# Altium PCB QR SCANNER NEW.PcbDoc (part 1 of 2)
Units mm, origin at the board's own origin, x right, y up, seen from the top; angles counter-clockwise.
Board outline 130 x 105 mm, 2 copper layers (Top Layer, Bottom Layer); 158 components, 113 nets, 501 pads, 106 vias.
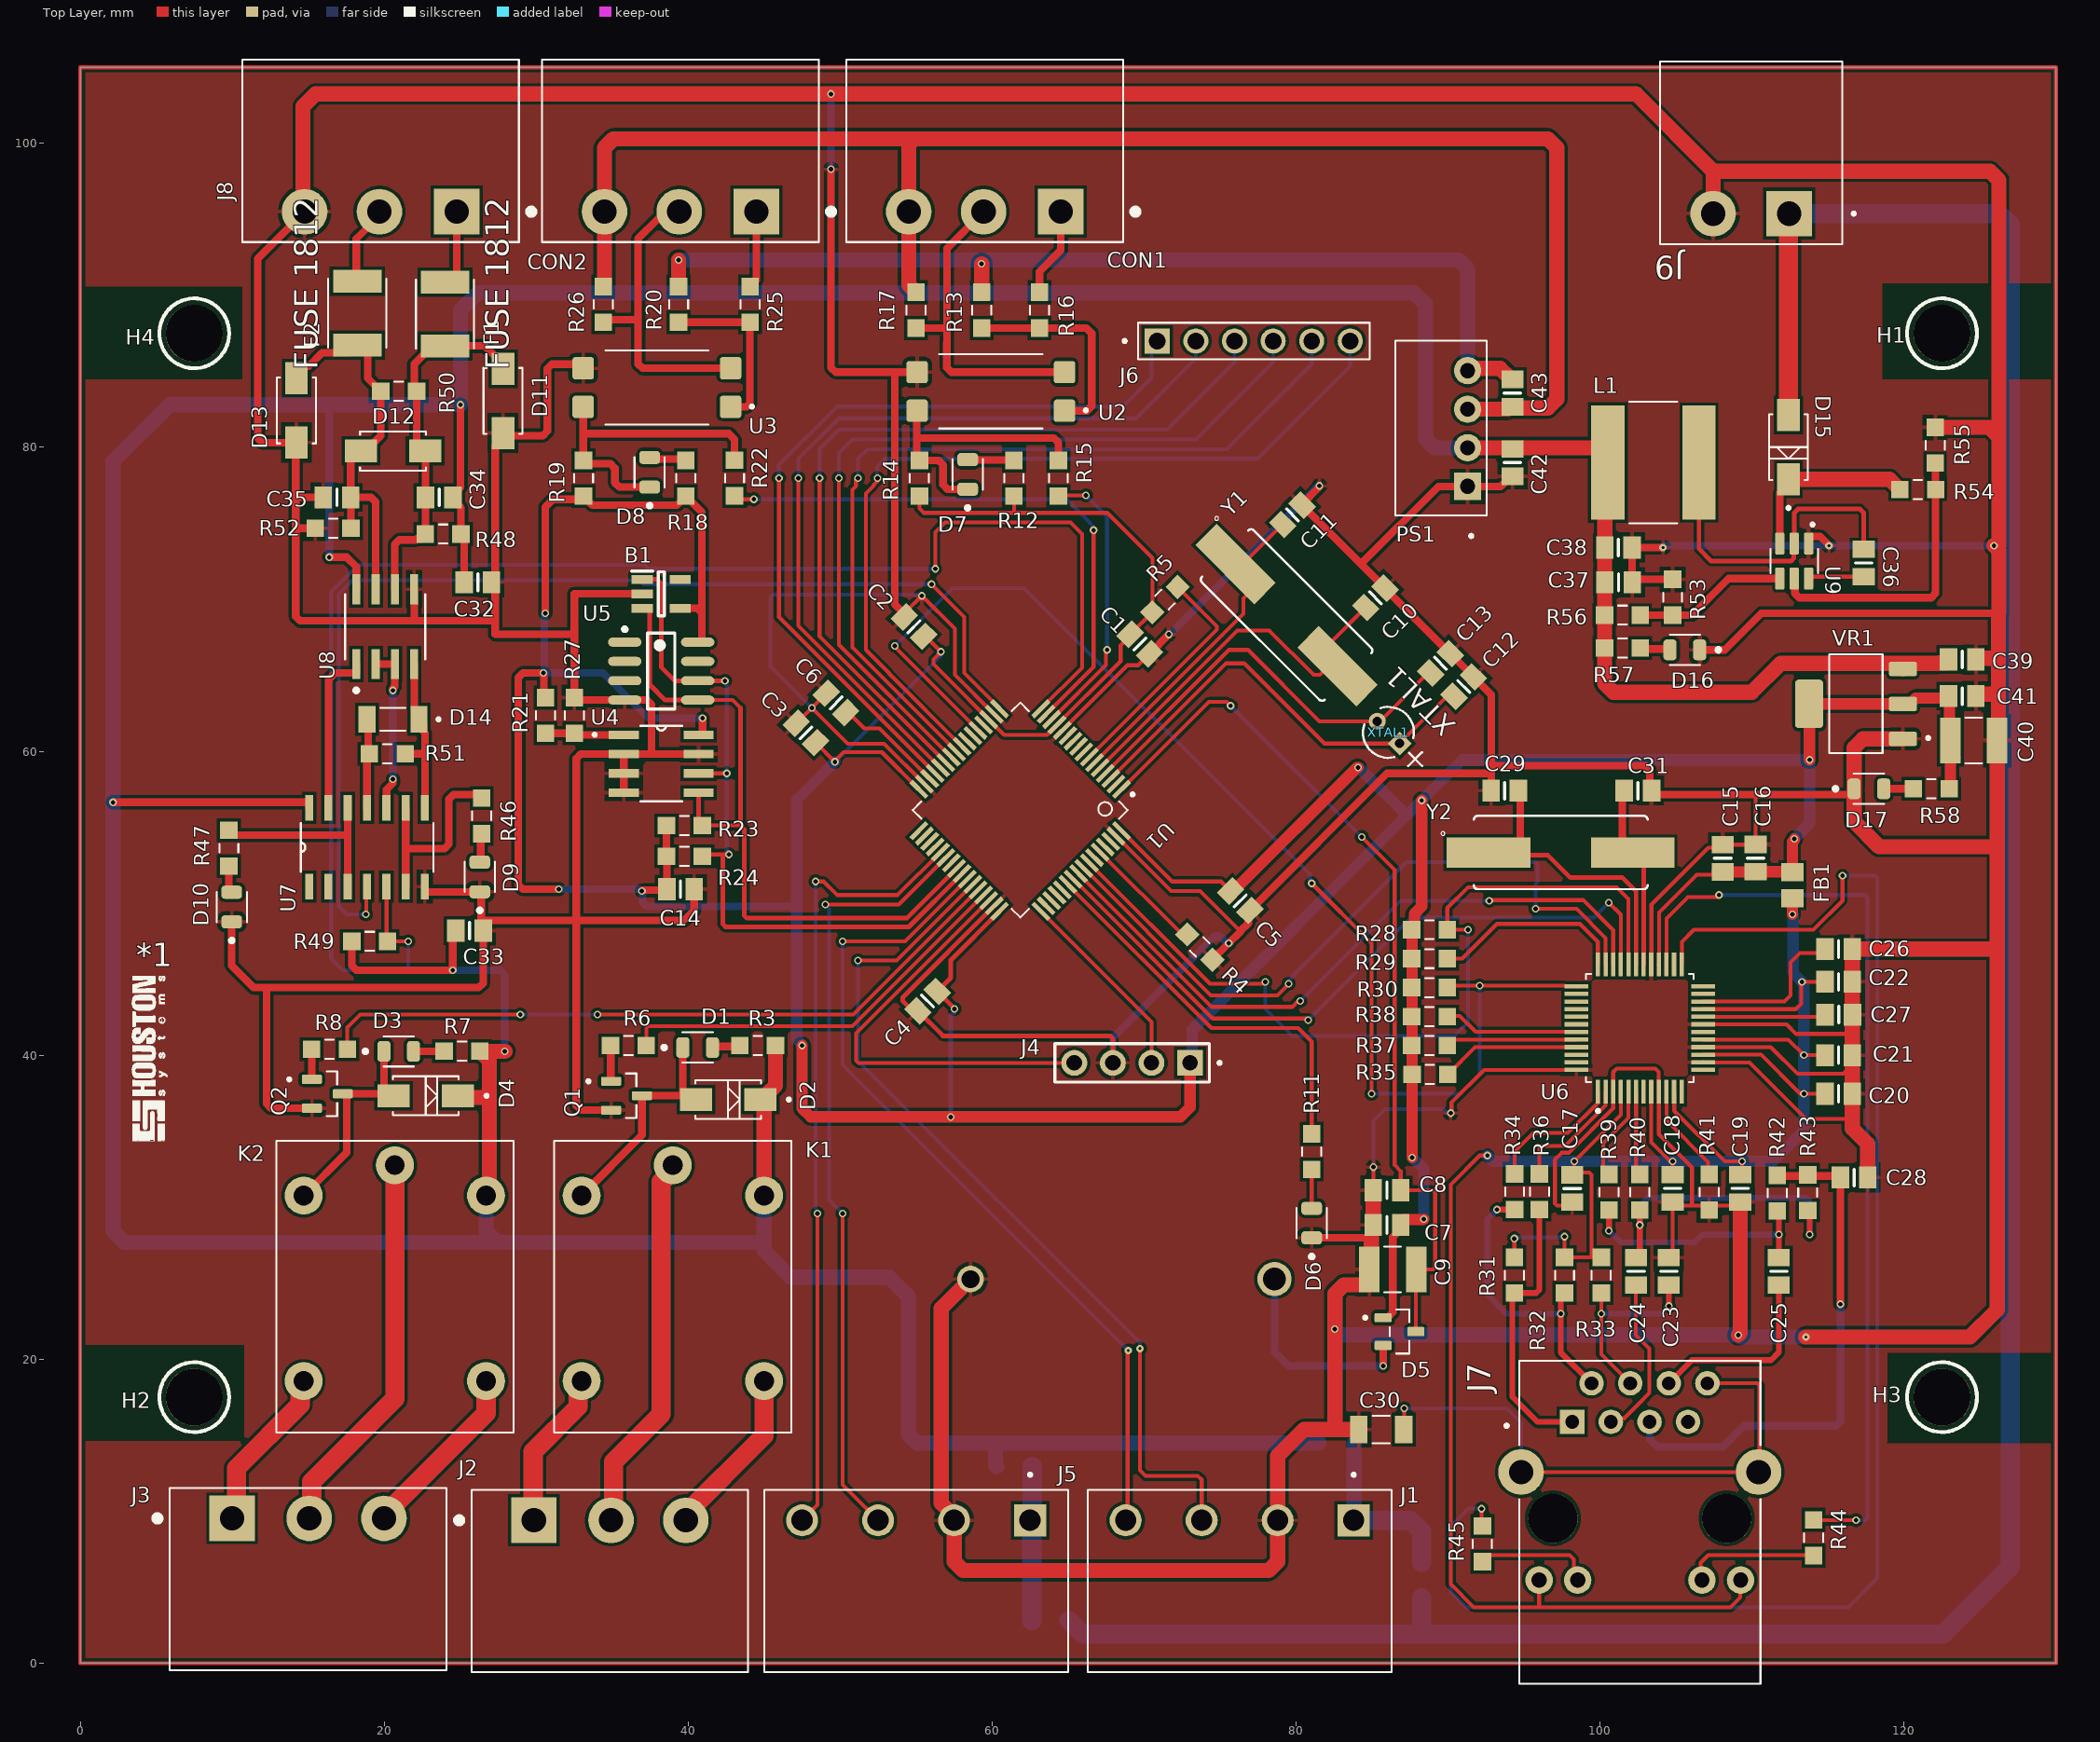
[diagram p0: Top Layer view]
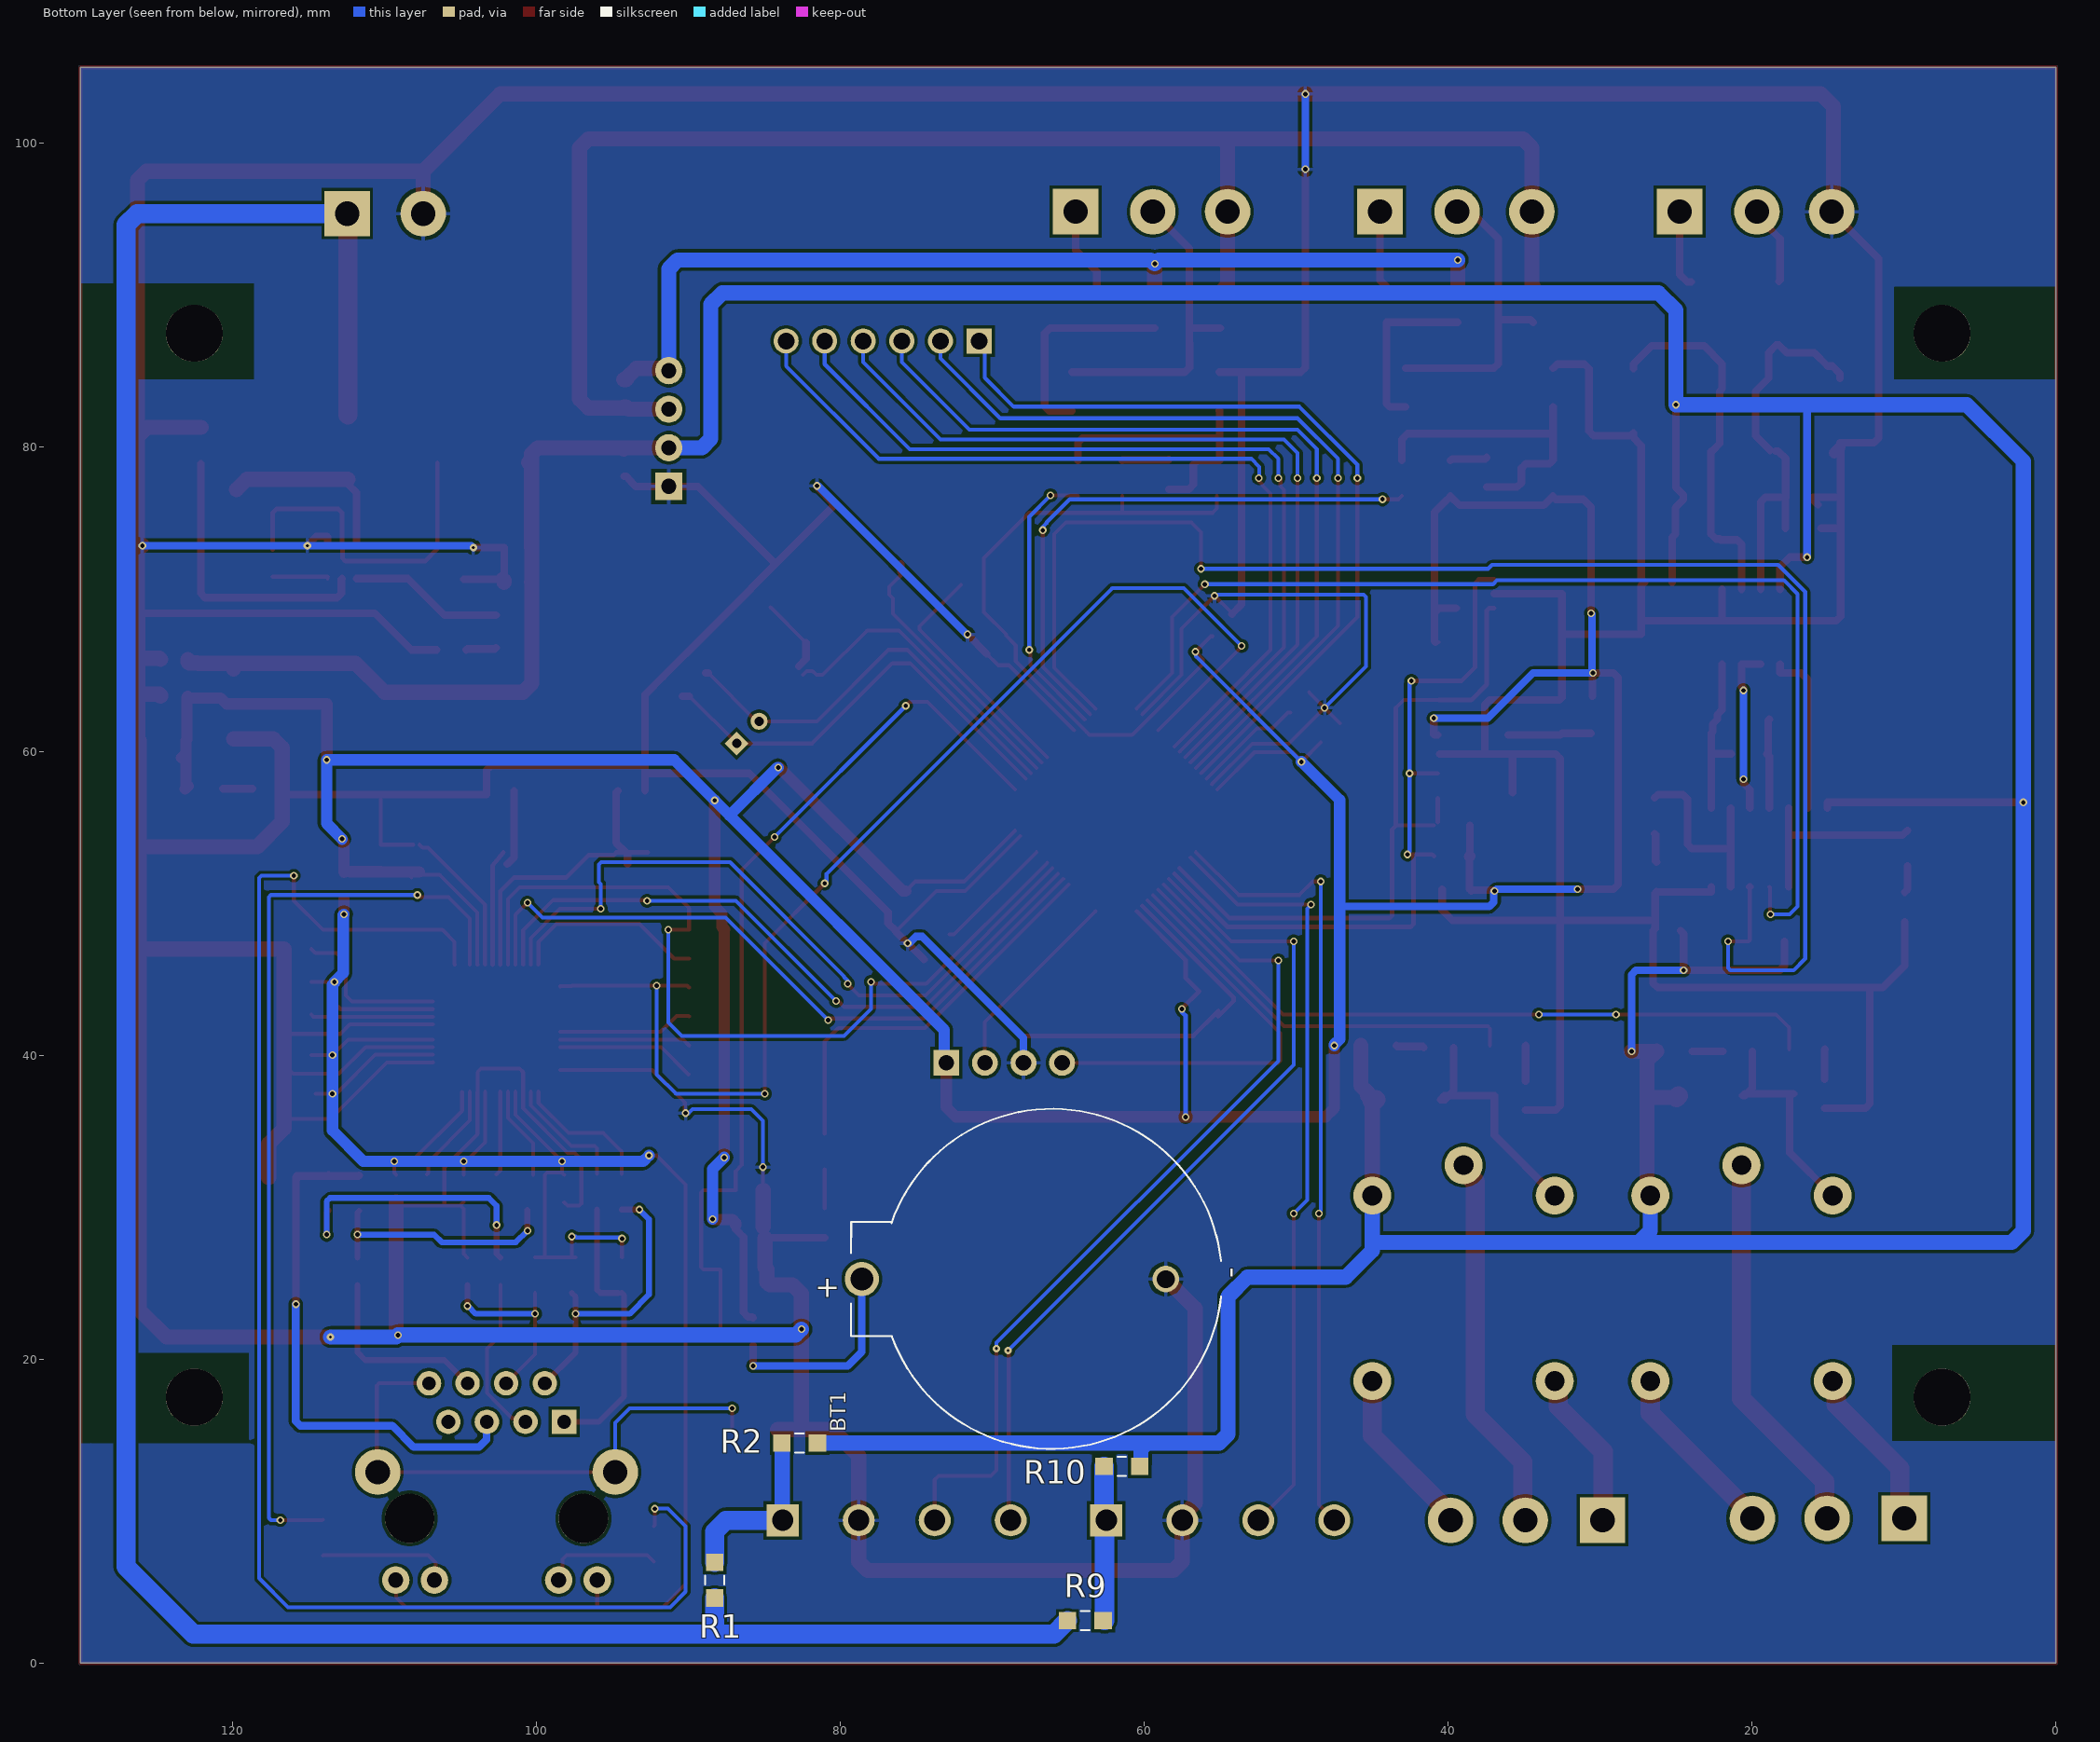
[diagram p1: Bottom Layer view, seen from below]
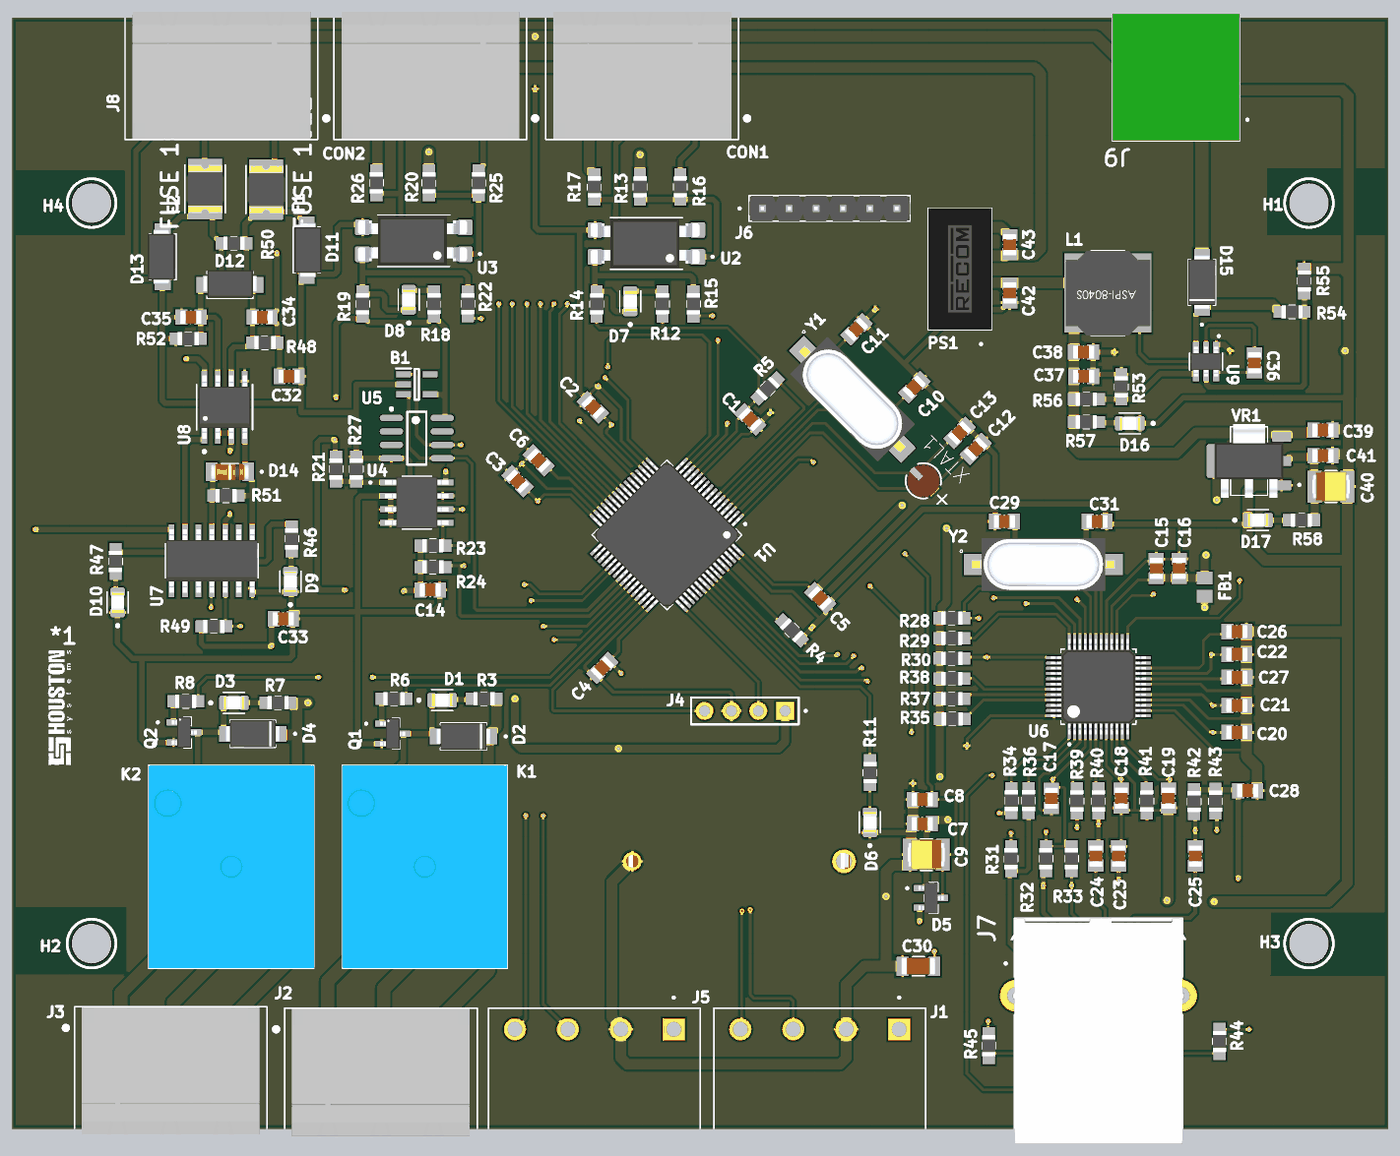
[diagram p3: 3D render of the assembled board from above, using the file's embedded part models]
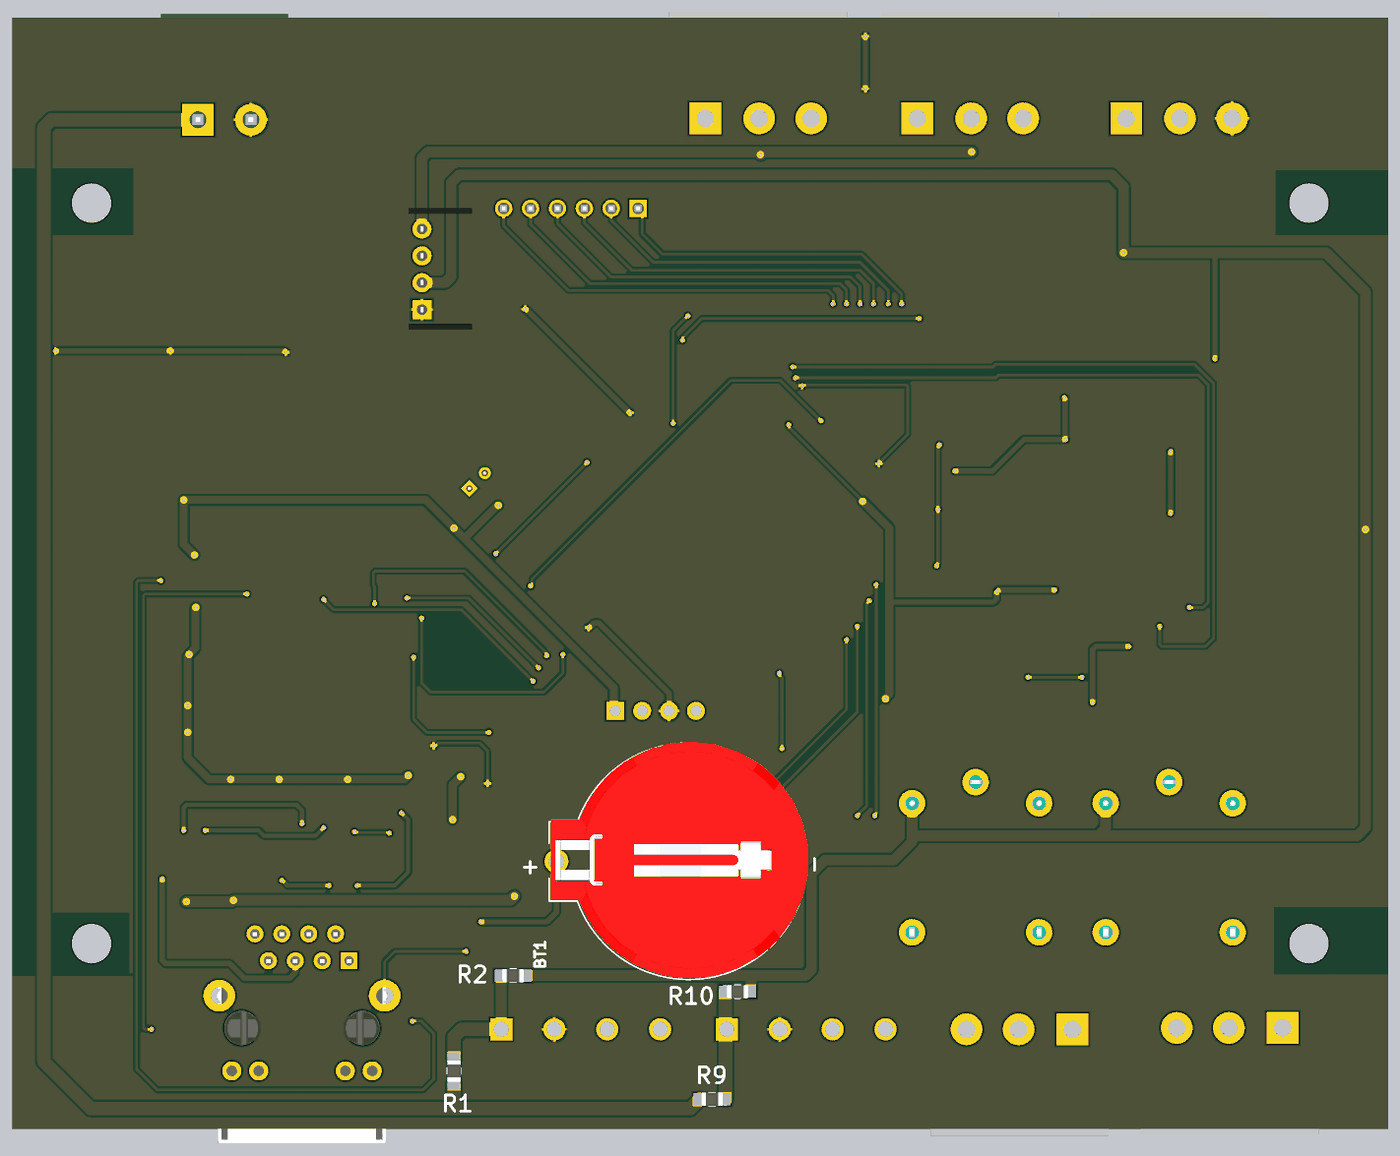
[diagram p4: 3D render of the assembled board from below, using the file's embedded part models]

## Layer stack, top to bottom
Top Solder: solder mask 0.0102, Solder Resist, Dk 3.5
Top Layer: signal copper 0.0356
Dielectric 1: dielectric 0.32, FR-4, Dk 4.8
Bottom Layer: signal copper 0.0356
Bottom Solder: solder mask 0.0102, Solder Resist, Dk 3.5

## Board outline
0,0 0,105 130,105 130,0

## Design rules (kind name [scope] priority, off if disabled: settings)
Clearance [All] p1: gap=0.2 ignorepadtopadclearanceinfootprint=TRUE
DiffPairsRouting [All] p1: maxlimit=0.254 minlimit=0.254 mostfreqgap=0.254 toplayer_minwidth=0.381 toplayer_maxwidth=0.381 toplayer_prefwidth=0.381 bottomlayer_minwidth=0.381 bottomlayer_maxwidth=0.381 bottomlayer_prefwidth=0.381 maxuncoupledlength=12.7
HoleSize [All] p1: absolutevalues=TRUE maxlimit=5 minlimit=0.1 maxpercent=80.000 minpercent=20.000
MinimumSolderMaskSliver [All] p1: minsoldermaskwidth=0
PolygonConnect [All] p1: connectstyle=Relief reliefconductorwidth=0.254 reliefentries=4 polygonreliefangle="90 Angle" airgapwidth=0.254
RoutingCorners [All] p1: cornerstyle=45-Degree minsetback=2 maxsetback=2.54
RoutingVias [All] p1: holewidth=0.2 width=0.5 viastyle="Through Hole" minholewidth=0.2 minwidth=0.5 maxholewidth=711 maxwidth=1.27
SilkToSolderMaskClearance [IsPad] p1: minsilkscreentomaskgap=0.1 clearancetoexposedcopper=TRUE
SolderMaskExpansion [All] p1: expansion=0.102 istentingtop=FALSE
SupplyNets "Schematic Supply Nets_9" [InNet('3V3')] p1: voltage=0.000
SupplyNets "Schematic Supply Nets_8" [InNet('+5')] p2: voltage=0.000
SupplyNets "Schematic Supply Nets_6" [InNet('GND')] p3: voltage=0.000
SupplyNets "Schematic Supply Nets_5" [InNet('+12')] p4: voltage=0.000
SupplyNets "Schematic Supply Nets_3" [InNet('AVDD')] p5: voltage=0.000
SupplyNets "Schematic Supply Nets_2" [InNet('SGND')] p6: voltage=0.000
SupplyNets "Schematic Supply Nets_1" [InNet('12VCC')] p7: voltage=0.000
SupplyNets "Schematic Supply Nets" [InNet('5VDC')] p8: voltage=0.000
Width [All] p1: maxlimit=2.5 minlimit=0.254 preferedwidth=0.254
25 further rules are at their usual default settings.

## Classes and differential pairs
differential pair class DIFF_100: RJ45 RX TX
net class "Single_50 ohm": INT MISO MOSI OSC_IN OSC_OUT RST SCS SWO/sck1 XI XO
component class Power: C36 C37 C38 C39 C40 C41 C42 C43 D15 D16 D17 J9 L1 PS1 R53 R54 R55 R56 R57 R58 U9 VR1
component class "LAN 485": *1 C15 C16 C17 C18 C19 C20 C21 C22 C23 C24 C25 C26 C27 C28 C29 C30 C31 C32 C33 C34 C35 D9 D10 D11 D12 D13 D14 F1 F2 FB1 H1 H2 H3 H4 J7 J8 R28 R29 R30 R31 R32 R33 R34 R35 R36 R37 R38 R39 R40 R41 R42 R43 R44 R45 R46 R47 R48 R49 R50 R51 R52 U6 U7 U8 Y2
component class main: B1 BT1 C1 C2 C3 C4 C5 C6 C7 C8 C9 C10 C11 C12 C13 C14 CON1 CON2 D1 D2 D3 D4 D5 D6 D7 D8 J1 J2 J3 J4 J5 J6 K1 K2 Q1 Q2 R1 R2 R3 R4 R5 R6 R7 R8 R9 R10 R11 R12 R13 R14 R15 R16 R17 R18 R19 R20 R21 R22 R23 R24 R25 R26 R27 U1 U2 U3 U4 U5 XTAL1 Y1
differential pair TX: +TX_P -TX_N
differential pair RX: +RX_P -RX_N
differential pair RJ45: +RJ45_P -RJ45_N

## Components (designator, comment, footprint, x,y, rotation, side; value= is the part's Value field where it differs from the comment)
*1 "HOUSTON_LOGO" HOUSTON_LOGO 8.255,37.719 r90 top
B1 "24AA02E48T-I_OT" SOT95P270X145-5N 38.227,70.358 r0 top
BT1 "Battery Holder (Open) Coin" "Battery Holder (Open) Coin" 68.58,25.273 r0 bottom
C1 "CAP 0.1uF 50V 0805" "CAP CER 0.1uF/50V 5%" 69.723,67.056 r135 top
C2 "CAP 0.1uF 50V 0805" "CAP CER 0.1uF/50V 5%" 54.863,68.2 r315 top
C3 "CAP 0.1uF 50V 0805" "CAP CER 0.1uF/50V 5%" 47.752,61.214 r315 top
C4 "CAP 0.1uF 50V 0805" "CAP CER 0.1uF/50V 5%" 55.753,43.561 r45 top
C5 "CAP 0.1uF 50V 0805" "CAP CER 0.1uF/50V 5%" 76.328,50.164 r135 top
C6 "CAP 4.7uF 50V 0805" "CAP CER 0.1uF/50V 5%" 49.732,63.179 r315 top
C7 "CAP 0.1uF 50V 0805" "CAP CER 0.1uF/50V 5%" 85.979,28.829 r0 top
C8 "CAP 0.1uF 50V 0805" "CAP CER 0.1uF/50V 5%" 85.979,31.115 r0 top
C9 "TANT CAP 10uF/16V 5% 3528(B)" "TANT CAP 3528(B)" 86.36,25.908 r180 top
C10 "CAP 20pF 50V 0805" "CAP CER 0.1uF/50V 5%" 85.217,70.104 r45 top
C11 "CAP 20pF 50V 0805" "CAP CER 0.1uF/50V 5%" 79.755,75.564 r45 top
C12 "CAP 4.3pF 50V 0805" "CAP CER 0.1uF/50V 5%" 91.028,64.262 r45 top
C13 "CAP 4.3pF 50V 0805" "CAP CER 0.1uF/50V 5%" 89.504,65.786 r45 top
C14 "CAP 0.1uF 50V 0805" "CAP CER 0.1uF/50V 5%" 39.497,50.927 r180 top
C15 "CAP 0.1uF 50V 0805" "CAP CER 0.1uF/50V 5%" 108.077,52.959 r270 top
C16 "CAP 10uF 50V 0805" "CAP CER 0.1uF/50V 5%" 110.236,52.97 r270 top
C17 "CAP 0.1uF 50V 0805" "CAP CER 0.1uF/50V 5%" 98.171,31.231 r90 top
C18 "CAP 0.1uF 50V 0805" "CAP CER 0.1uF/50V 5%" 104.775,31.242 r90 top
C19 "CAP 0.1uF 50V 0805" "CAP CER 0.1uF/50V 5%" 109.22,31.242 r90 top
C20 "CAP 0.1uF 50V 0805" "CAP CER 0.1uF/50V 5%" 115.697,37.465 r180 top
C21 "CAP 0.1uF 50V 0805" "CAP CER 0.1uF/50V 5%" 115.697,40.005 r180 top
C22 "CAP 0.1uF 50V 0805" "CAP CER 0.1uF/50V 5%" 115.697,44.831 r180 top
C23 "CAP 22nF 50V 0805" "CAP CER 0.1uF/50V 5%" 104.521,25.781 r270 top
C24 "CAP 6.8nF 50V 0805" "CAP CER 0.1uF/50V 5%" 102.362,25.781 r90 top
C25 "CAP 6.8nF 50V 0805" "CAP CER 0.1uF/50V 5%" 111.76,25.781 r90 top
C26 "CAP 10nF 50V 0805" "CAP CER 0.1uF/50V 5%" 115.697,46.99 r180 top
C27 "CAP 4.7uF 50V 0805" "CAP CER 0.1uF/50V 5%" 115.708,42.672 r180 top
C28 "CAP 10nF 50V 0805" "CAP CER 0.1uF/50V 5%" 116.712,31.95 r180 top
C29 "CAP 18pF 50V 0805" "CAP CER 0.1uF/50V 5%" 93.726,57.404 r180 top
C30 "CAP CER 1nF/2KV 1206 5%" "CAP CER 1nF/2KV 1206 5%" 85.598,15.367 r0 top
C31 "CAP 18pF 50V 0805" "CAP CER 0.1uF/50V 5%" 102.489,57.404 r0 top
C32 "CAP 0.1uF 50V 0805" "CAP CER 0.1uF/50V 5%" 26.162,71.12 r0 top
C33 "CAP 0.1uF 50V 0805" "CAP CER 0.1uF/50V 5%" 25.612,48.199 r180 top
C34 "CAP 1nF 50V 0805" "CAP CER 0.1uF/50V 5%" 23.622,76.708 r0 top
C35 "CAP 1nF 50V 0805" "CAP CER 0.1uF/50V 5%" 16.891,76.708 r180 top
C36 "CAP 0.1uF 50V 0805" "CAP CER 0.1uF/50V 5%" 117.348,72.39 r270 top
C37 "CAP 22uF 50V 0805" "CAP CER 0.1uF/50V 5%" 101.219,71.12 r0 top
C38 "CAP 22uF 50V 0805" "CAP CER 0.1uF/50V 5%" 101.208,73.406 r0 top
C39 "CAP 10uF 50V 0805" "CAP CER 0.1uF/50V 5%" 123.825,66.04 r180 top
C40 "TANT CAP 10uF/16V 5% 3528(B)" "TANT CAP 3528(B)" 124.587,60.706 r0 top
C41 "CAP 0.1uF 50V 0805" "CAP CER 0.1uF/50V 5%" 123.825,63.627 r180 top
C42 "CAP 0.1uF 50V 0805" "CAP CER 0.1uF/50V 5%" 94.234,78.994 r90 top
C43 "CAP 0.1uF 50V 0805" "CAP CER 0.1uF/50V 5%" 94.234,83.566 r90 top
CON1 "3 Pin Terminal Block 5MM RA" "3 Pin Terminal Block 5MM RA" 59.516,95.504 r180 top
CON2 "3 Pin Terminal Block 5MM RA" "3 Pin Terminal Block 5MM RA" 39.492,95.504 r180 top
D1 "LED-0805" LED-0805 40.624,40.509 r0 top
D2 "DIODE M7 DO-214AC" "DIODE M7 DO-214AC" 42.628,37.084 r180 top
D3 "LED-0805" LED-0805 20.955,40.255 r0 top
D4 "DIODE M7 DO-214AC" "DIODE M7 DO-214AC" 22.733,37.334 r180 top
D5 "Schottky Diode SOT23" "Schottky Diode SOT23 BAT54C" 86.8,21.818 r0 top
D6 "LED-0805" LED-0805 81.026,28.956 r90 top
D7 "LED-0805" LED-0805 58.39,78.218 r90 top
D8 "LED-0805" LED-0805 37.465,78.359 r90 top
D9 "LED-0805" LED-0805 26.289,51.73 r90 top
D10 "LED-0805" LED-0805 9.97,49.753 r90 top
D11 "TVS SMAJ6.0CA BiD" "TVS SMAJ6.0CA DO-214AC (SMA)" 27.813,83.058 r270 top
D12 "TVS SMAJ6.0CA BiD" "TVS SMAJ6.0CA DO-214AC (SMA)" 20.574,79.756 r0 top
D13 "TVS SMAJ6.0CA BiD" "TVS SMAJ6.0CA DO-214AC (SMA)" 14.224,82.423 r90 top
D14 "DIODE-1N4148W-SOD-80" DIODE-1N4148W-SOD-80 20.574,62.103 r180 top
D15 "DIODE M7 DO-214AC" "DIODE M7 DO-214AC" 112.395,80.01 r90 top
D16 "LED-0805" LED-0805 105.578,66.675 r180 top
D17 "LED-0805" LED-0805 117.688,57.531 r0 top
F1 "FUSE 1812" "FUSE 1812" 24.003,88.773 r90 top
F2 "FUSE 1812" "FUSE 1812" 18.231,88.829 r90 top
FB1 "FB 0805" "FB 0805" 112.649,51.181 r270 top
H1 "ScrewHole_3.75mmD" "ScrewHole_3.75mmD - duplicate" 122.5,87.5 r0 top locked
H2 "ScrewHole_3.75mmD" "ScrewHole_3.75mmD - duplicate" 7.5,17.5 r0 top locked
H3 "ScrewHole_3.75mmD" "ScrewHole_3.75mmD - duplicate" 122.5,17.5 r0 top locked
H4 "ScrewHole_3.75mmD" "ScrewHole_3.75mmD - duplicate" 7.5,87.5 r0 top locked
J1 "282811-4" TE_282811-4 76.287,9.398 r180 top
J2 "3 Pin Terminal Block 5MM RA" "3 Pin Terminal Block 5MM RA" 34.845,9.398 r0 top
J3 "3 Pin Terminal Block 5MM RA" "3 Pin Terminal Block 5MM RA" 14.986,9.525 r0 top
J4 "BURGE 4 PIN 2.54mm" "BURGE 4 PIN 2.54mm" 69.215,39.497 r180 top
J5 "282811-4" TE_282811-4 54.998,9.398 r180 top
J6 "BERGE 6 PIN 2.54mm" "BERGE 6 PIN 2.54mm" 77.216,86.995 r0 top
J7 "RJ45 8P8C" "RJ45 8P8C" 102.616,9.525 r0 top locked
J8 "3 Pin Terminal Block 5MM RA" "3 Pin Terminal Block 5MM RA" 19.765,95.504 r180 top
J9 "2 Pin Terminal Block 5MM RA" "2 Pin Terminal Block 5MM RA" 112.442,95.377 r180 top
K1 "Relay_5Pin SPDT THT" "Relay_5Pin SPDT THT" 38.989,24.765 r270 top
K2 "Relay_5Pin SPDT THT" "Relay_5Pin SPDT THT" 20.701,24.765 r270 top
L1 "INDUCTOR 8040S SWPA8040S120MT" "INDUCTOR 8040S SWPA8040S120MT" 103.505,78.994 r180 top
PS1 "RFM-0505S SIP4" RFM-0505S 89.535,81.28 r90 top
Q1 "NPN SOT-23 SMT BC848C_RFG" "NPN SOT-23 SMT BC848C_RFG" 35.941,37.338 r0 top
Q2 "NPN SOT-23 SMT BC848C_RFG" "NPN SOT-23 SMT BC848C_RFG" 16.256,37.465 r0 top
R1 "RES 10K 0.25W 5% 0805" "RES 0805 10K/0.25W 5%" 88.265,5.461 r90 bottom
R2 "RES 10K 0.25W 5% 0805" "RES 0805 10K/0.25W 5%" 82.677,14.478 r0 bottom
R3 "RES 470R 0.25W 5% 0805" "RES 0805 10K/0.25W 5%" 44.577,40.64 r0 top
R4 "RES 10K 0.25W 5% 0805" "RES 0805 10K/0.25W 5%" 73.66,47.117 r135 top
R5 "RES 10K 0.25W 5% 0805" "RES 0805 10K/0.25W 5%" 71.374,69.977 r45 top
R6 "RES 470R 0.25W 5% 0805" "RES 0805 10K/0.25W 5%" 36.068,40.64 r180 top
R7 "RES 470R 0.25W 5% 0805" "RES 0805 10K/0.25W 5%" 25.118,40.264 r0 top
R8 "RES 470R 0.25W 5% 0805" "RES 0805 10K/0.25W 5%" 16.399,40.396 r180 top
R9 "RES 10K 0.25W 5% 0805" "RES 0805 10K/0.25W 5%" 63.881,2.794 r180 bottom
R10 "RES 10K 0.25W 5% 0805" "RES 0805 10K/0.25W 5%" 61.468,12.954 r0 bottom
R11 "RES 330R 0.25W 5% 0805" "RES 0805 10K/0.25W 5%" 81.026,33.655 r90 top
R12 "RES 330R 0.25W 5% 0805" "RES 0805 10K/0.25W 5%" 61.438,77.964 r270 top
R13 "RES 15K 0.25W 5% 0805" "RES 0805 10K/0.25W 5%" 59.309,89.027 r270 top
R14 "RES 5.1K 0.25W 5% 0805" "RES 0805 10K/0.25W 5%" 55.215,77.964 r90 top
R15 "RES 0E 0.25W 5% 0805" "RES 0805 10K/0.25W 5%" 64.359,77.964 r270 top
R16 "RES 1K 0.25W 5% 0805" "RES 0805 10K/0.25W 5%" 63.119,89.027 r270 top
R17 "RES 0E 0.25W 5% 0805" "RES 0805 10K/0.25W 5%" 54.991,89.027 r270 top
R18 "RES 330R 0.25W 5% 0805" "RES 0805 10K/0.25W 5%" 39.848,77.964 r270 top
R19 "RES 5.1K 0.25W 5% 0805" "RES 0805 10K/0.25W 5%" 33.117,77.964 r90 top
R20 "RES 15K 0.25W 5% 0805" "RES 0805 10K/0.25W 5%" 39.37,89.408 r270 top
R21 "RES 4.7K 0.25W 5% 0805" "RES 0805 10K/0.25W 5%" 30.607,62.357 r90 top
R22 "RES 0E 0.25W 5% 0805" "RES 0805 10K/0.25W 5%" 43.053,77.978 r270 top
R23 "RES 4.7K 0.25W 5% 0805" "RES 0805 10K/0.25W 5%" 39.751,55.118 r180 top
R24 "RES 4.7K 0.25W 5% 0805" "RES 0805 10K/0.25W 5%" 39.751,53.086 r180 top
R25 "RES 1K 0.25W 5% 0805" "RES 0805 10K/0.25W 5%" 44.069,89.408 r270 top
R26 "RES 0E 0.25W 5% 0805" "RES 0805 10K/0.25W 5%" 34.417,89.408 r270 top
R27 "RES 4.7K 0.25W 5% 0805" "RES 0805 10K/0.25W 5%" 32.512,62.357 r270 top
R28 "RES 10K 0.25W 5% 0805" "RES 0805 10K/0.25W 5%" 88.773,48.26 r180 top
R29 "RES 10K 0.25W 5% 0805" "RES 0805 10K/0.25W 5%" 88.773,46.355 r180 top
R30 "RES 10K 0.25W 5% 0805" "RES 0805 10K/0.25W 5%" 88.773,44.45 r180 top
R31 "RES 49E9 0.25W 1% 0805" "RES 0805 10K/0.25W 5%" 94.361,25.527 r90 top
R32 "RES 49E9 0.25W 1% 0805" "RES 0805 10K/0.25W 5%" 97.663,25.527 r90 top
R33 "RES 10E 0.25W 5% 0805" "RES 0805 10K/0.25W 5%" 100.076,25.527 r90 top
R34 "RES 0E 0.25W 5% 0805" "RES 0805 10K/0.25W 5%" 94.381,31.02 r90 top
R35 "RES 10K 0.25W 5% 0805" "RES 0805 10K/0.25W 5%" 88.805,38.735 r180 top
R36 "RES 0E 0.25W 5% 0805" "RES 0805 10K/0.25W 5%" 96.012,31.02 r90 top
R37 "RES 10K 0.25W 5% 0805" "RES 0805 10K/0.25W 5%" 88.773,40.64 r180 top
R38 "RES 10K 0.25W 5% 0805" "RES 0805 10K/0.25W 5%" 88.773,42.545 r180 top
R39 "RES 0E 0.25W 5% 0805" "RES 0805 10K/0.25W 5%" 100.584,30.988 r90 top
R40 "RES 0E 0.25W 5% 0805" "RES 0805 10K/0.25W 5%" 102.616,30.988 r90 top
R41 "RES 12.4K 0.25W 5% 0805" "RES 0805 10K/0.25W 5%" 107.188,30.988 r90 top
R42 "RES 49E9 0.25W 1% 0805" "RES 0805 10K/0.25W 5%" 111.654,30.925 r270 top
R43 "RES 49E9 0.25W 1% 0805" "RES 0805 10K/0.25W 5%" 113.665,30.956 r270 top
R44 "RES 330E 0.25W 5% 0805" "RES 0805 10K/0.25W 5%" 114.046,8.255 r270 top
R45 "RES 330E 0.25W 5% 0805" "RES 0805 10K/0.25W 5%" 92.257,7.847 r270 top
R46 "RES 330R 0.25W 5% 0805" "RES 0805 10K/0.25W 5%" 26.416,55.753 r90 top
R47 "RES 330R 0.25W 5% 0805" "RES 0805 10K/0.25W 5%" 9.779,53.626 r90 top
R48 "RES 1K 0.25W 5% 0805" "RES 0805 10K/0.25W 5%" 23.876,74.295 r180 top
R49 "RES 10K 0.25W 5% 0805" "RES 0805 10K/0.25W 5%" 19.05,47.498 r180 top
R50 "RES120E 0.25W 5% 0805" "RES 0805 10K/0.25W 5%" 20.955,83.693 r0 top
R51 "RES 1K 0.25W 5% 0805" "RES 0805 10K/0.25W 5%" 20.202,59.832 r0 top
R52 "RES 1K 0.25W 5% 0805" "RES 0805 10K/0.25W 5%" 16.637,74.676 r0 top
R53 "RES 10K 0.25W 5% 0805" "RES 0805 10K/0.25W 5%" 104.775,70.136 r90 top
R54 "RES 15K 0.25W 5% 0805" "RES 0805 10K/0.25W 5%" 120.904,77.216 r0 top
R55 "RES 10K 0.25W 5% 0805" "RES 0805 10K/0.25W 5%" 122.047,80.137 r90 top
R56 "RES 75K 0.25W 5% 0805" "RES 0805 10K/0.25W 5%" 101.473,68.961 r0 top
R57 "RES 470R 0.25W 5% 0805" "RES 0805 10K/0.25W 5%" 101.473,66.802 r180 top
R58 "RES 220R 0.25W 5% 0805" "RES 0805 10K/0.25W 5%" 121.793,57.531 r0 top
U1 "STM32F401RET6 LQFP-64" "STM32F401RE Cortex-M4" 61.849,56.134 r225 top
U2 "OPTOCPLR EL817S1-FV" "OPTOCPLR EL817S1-FV" 59.914,83.679 r180 top
U3 "OPTOCPLR EL817S1-FV" "OPTOCPLR EL817S1-FV" 37.943,83.933 r180 top
U4 "EEPROM AT24C512C SOIC-8" "EEPROM AT24C512C SOIC-8" 38.227,59.182 r0 top
U5 "24AA02E48T-I/SN" SOIC-SN8_N 38.227,65.278 r0 top
U6 "W5500 LQFP-48" "W5500 LQFP-48" 102.616,41.783 r90 top
U7 "74HC14D SOIC-14" "74HC14D SOIC-14" 18.87,53.68 r90 top
U8 "MAX485CSA SOIC-8" MAX485CSA 20.066,68.199 r90 top
U9 "TPS54202DDCT" SOT95P280X110-6N 112.776,72.517 r270 top
VR1 "LM1117IMPX-3.3V SOT-223" "LM1117IMPX-3.3V SOT-223" 116.84,63.119 r180 top
XTAL1 "MCRJ332768F1220HOW" CRYSTAL_MCRJ332768F1220HOW_MTC 86.808,60.512 r135 top
Y1 "Crystal 8 Mhz SMD 2 pin" "Crystal 16 Mhz SMD 2 pin" 79.375,68.961 r315 top
Y2 "Crystal 25 Mhz SMD 2 pin" "Crystal 16 Mhz SMD 2 pin" 97.409,53.34 r0 top

## Footprints (in the part's own frame and the unit in brackets; to place one, negate y for a bottom-side part, rotate by r counter-clockwise, add the part's x,y. Pads: shape width x height; smd on the part's side, far side on the other; paste and mask are expansions set on the pad)
"2 Pin Terminal Block 5MM RA" [mm]
  rect 3x3 hole 1.6: 1(0,0)
  round 3 hole 1.6: 2(5,0)
  silkscreen extent -4.35,-10 8.5,2, body extent -3.5,-10 8.5,2, height 8.5
"3 Pin Terminal Block 5MM RA" [mm]
  rect 3x3 hole 1.6: 1(-5,0)
  round 3 hole 1.6: 2(0.08,0) 3(5,0)
  silkscreen extent -10.11,-10 9.1,2, body extent -8.42,-10.06 8.38,1.94, height 8.97
"74HC14D SOIC-14" [mil] "Inverter IC 6 Channel Schmitt Trigger 14-SO/SOIC-14"
  rect 67x21 smd: 1(-102,150) 2(-102,100) 3(-102,50) 4(-102,0) 5(-102,-50) 6(-102,-100) 7(-102,-150) 8(102,-150) 9(102,-100) 10(102,-50) 11(102,0) 12(102,50) 13(102,100) 14(102,150)
  silkscreen extent -63,-172 63,172, body extent -118,-170 118,170, height 69
"Battery Holder (Open) Coin" [mm] "Battery Holder (Open) Coin"
  round 1.755 hole 1.17: NEG(-10,0)
  round 2.25 hole 1.5: POS(10,0)
  silkscreen extent -13.63,-11.2 10.7,11.17, body extent -13.84,-11.3 10.54,11.05, height 8.74
"BERGE 6 PIN 2.54mm" [mm] "BERGE 6 PIN 2.54mm, AMPHENOL_68604-406HLF"
  rect 1.65x1.65 / inner round 1.65 / far side rect 1.65x1.65 hole 1.1: 1(-6.35,0)
  round 1.65 hole 1.1: 2(-3.81,0) 3(-1.27,0) 4(1.27,0) 5(3.81,0) 6(6.35,0)
  silkscreen extent -8.6,-1.2 7.62,1.2, body extent -7.62,-1.2 7.62,1.2, height 12.19
"BURGE 4 PIN 2.54mm" [mm] "BURGE 4 PIN 2.54mm TSW-104-X-X-S-LL"
  rect 1.7x1.7 hole 1.02: 01(-3.81,0)
  round 1.7 hole 1.02: 02(-1.27,0) 03(1.27,0) 04(3.81,0)
  silkscreen extent -5.85,-1.27 5.08,1.27
"CAP CER 0.1uF/50V 5%" [mm] "CAP CER 0.1uF/50V  Ceramic Capacitor X7R 0805 (2012 Metric) SMT"
  rect 1.15x1.45 smd: 1(-0.9,0) 2(0.9,0)
  silkscreen extent 0,-0.55 0,0.55, body extent -1,-0.62 1,0.62, height 1.35
"CAP CER 1nF/2KV 1206 5%" [mm] "1000 pF Â±10% 2000V (2kV) Ceramic Capacitor X7R 1206 (3216 Metric) C1206C102KGRACAUTO"
  rect 1.16x1.82 smd: 1(-1.475,0) 2(1.475,0)
  silkscreen extent -0.57,-0.9 0.57,0.9, body extent -1.6,-0.8 1.6,0.8, height 1.75
"Crystal 16 Mhz SMD 2 pin" [mm] "16 MHz Â±30ppm Crystal 20pF 60 Ohms HC-49/US FOXSDLF/128-20 16 Mhz Crystal SMD –CSM-4ALX(28ALX) SMT12.5mmX4.85mmX4mm"
  rect 5.5x2 smd: 1(-4.75,0) 2(4.75,0)
  silkscreen extent -7.88,-2.41 5.71,2.41, body extent -6.75,-2.5 6.75,2.5, height 4.5
CRYSTAL_MCRJ332768F1220HOW_MTC [mil]
  rect 44x44 hole 24 paste-99999 mask+0: 1(0,0)
  round 44 hole 24 paste-99999 mask+0: 2(81.5,0)
  silkscreen extent -82,-66 99,66, body extent -20,-61 103,61, height 328
"DIODE M7 DO-214AC" [mm] "M7 General Purpose SMD Rectifier Diode SMA (DO-214AC) 1A 1000V 1n4007  DIOM4325X250N"
  rect 2.12x1.5 smd: A(2.115,0) C(-2.115,0)
  silkscreen extent -4.1,-1.28 2.16,1.28, body extent -2.57,-1.28 2.57,1.28, height 2.5
DIODE-1N4148W-SOD-80 [mm] "DIODE-1N4148W-SOD-80 is a general-purpose silicon diode LL4148_L1G"
  rect 1.11x1.73 smd: A(1.705,0) C(-1.705,0)
  silkscreen extent -3.1,-0.75 0.83,0.75, body extent -1.75,-0.76 1.75,0.83, height 1.57
"EEPROM AT24C512C SOIC-8" [mil] "EEPROM Memory IC 512Kb (64K x 8) IÂ²C 400 kHz 900 ns SOIC-8 AT24C512C-SSHM-T"
  rect 78x22 smd: 1(-97,75) 2(-97,25) 3(-97,-25) 4(-97,-75) 5(97,-75) 6(97,-25) 7(97,25) 8(97,75)
  silkscreen extent -176,-98 54,98, body extent -118,-96 118,96, height 69
"FB 0805" [mm] "MH2029-101Y-Bourns Inc.-Ferrite Bead, 100 Ohms @ 100 MHz , Signal Line Ferrite Bead 0805 (2012 Metric) 2A 100mOhm"
  rect 1.2x1.47 smd: 1(-0.86,0) 2(0.86,0)
"FUSE 1812" [mm] "Polymeric PTC Resettable Fuse 60V 100 mA Ih Surface Mount 1812 (4532 Metric), Concave, MF-MSMF010-2"
  rect 1.5x3.2 smd: 1(-2.1,0) 2(2.1,0)
  silkscreen extent -2.27,-1.91 2.27,1.91, body extent -2.27,-1.62 2.27,1.62, height 0.85
HOUSTON_LOGO [mm]
  silkscreen extent -3.35,2.52 7.49,4.87
"INDUCTOR 8040S SWPA8040S120MT" [mm]
  rect 2.2x7.5 smd: 1(-3,0) 2(3,0)
  silkscreen extent -1.58,-4 1.58,4, body extent -4,-4 4,4, height 4
LED-0805 [mm] "Red 640nm LED Indication - Discrete 1.85V 0805 (2012 Metric) SMT APT2012SRCPRV"
  rrect50% 0.86x1.36 smd: A(0.975,0) C(-0.975,0)
  silkscreen extent -2.3,-0.99 1,1, body extent -1,-0.63 1,0.63, height 0.75
"LM1117IMPX-3.3V SOT-223" [mm] "LM1117IMPX-3.3V 800-mA 15-V linear voltage regulator SOT230P700X180-4N"
  rrect25% 1.84x0.93 smd: 1(-3.085,2.3) 2(-3.085,0) 3(-3.085,-2.3)
  rrect25% 1.84x3.19 smd: 4(3.085,0)
  silkscreen extent -4.85,-3.25 1.75,3.25, body extent -3.5,-3.25 3.5,3.25, height 1.8
MAX485CSA [mil] "MAX485CSA-RS-485/RS-422 Transceivers, SOIC-8"
  rect 78x21 smd: 1(-97,75) 2(-97,25) 3(-97,-25) 4(-97,-75) 5(97,-75) 6(97,-25) 7(97,25) 8(97,75)
  silkscreen extent -170,-104 84,104, body extent -118,-96 118,96, height 69
"NPN SOT-23 SMT BC848C_RFG" [mm] "NPN SOT-23 SMT BC848C_RFG SOT95P237X112-3N"
  rrect25% 1.32x0.59 smd: 1(-1.015,0.95) 2(-1.015,-0.95) 3(1.015,0)
  silkscreen extent -2.6,-1.46 0.65,1.46, body extent -1.19,-1.46 1.19,1.46, height 1.12
"OPTOCPLR EL817S1-FV" [mm] "OPTOCPLR EL817S1 SOIC254P1030X390-4N_EL817S1-FV"
  rrect25% 1.41x1.47 smd: 1(-4.85,1.27) 2(-4.85,-1.27) 3(4.85,-1.27) 4(4.85,1.27)
  silkscreen extent -6.35,-2.44 3.4,2.44, body extent -5.02,-2.29 5.28,2.29, height 3.9
"Relay_5Pin SPDT THT" [mm] "Relay_5Pin SPDT THT RELAY_SRD-03VDC-SL-C"
  round 2.5 hole 1.3: COIL1(-6,6) COIL2(-6,-6) COM(-8,0) NC(6.2,6) NO(6.2,-6)
  silkscreen extent -9.6,-7.8 9.6,7.8, body extent -9.6,-7.8 9.6,7.8, height 15.8
"RES 0805 10K/0.25W 5%" [mm]
  rect 1.15x1.15 smd: 1(-1.175,0) 2(1.175,0)
  silkscreen extent -0.28,-0.63 0.28,0.63, body extent -1,-0.63 1,0.63, height 0.7
RFM-0505S [mm] "DC-DC Converter/Isolator, SIP4, THT S/T 1kV unreg, Single Output, 1W, 5V Out, RFM Series RFM-0505S"
  rect 1.8x1.8 hole 1: 1(-3.85,-1.75)
  round 1.8 hole 1: 2(-1.31,-1.75) 3(1.23,-1.75) 4(3.77,-1.75)
  silkscreen extent -7.21,-3 5.75,3, body extent -5.75,-3 5.75,3, height 9.5
"RJ45 8P8C" [mm] "RJ45 8P8C CUI_CRJ011-ML1-TH"
  round 1.808 hole 1: 9(-6.63,-4.06) 10(-4.09,-4.06) 11(4.09,-4.06) 12(6.63,-4.06)
  rect 1.608x1.608 hole 0.9: P1(-4.445,6.35)
  round 1.608 hole 0.9: P2(-3.175,8.89) P3(-1.905,6.35) P4(-0.635,8.89) P5(0.635,6.35) P6(1.905,8.89) P7(3.175,6.35) P8(4.445,8.89)
  round 3 hole 1.6: S1(-7.815,3.05) S2(7.815,3.05)
  round 3.25 hole 3.25 unplated: ""(-5.715,0) ""(5.715,0)
  silkscreen extent -8.87,-10.89 7.94,10.38, body extent -8.34,-10.92 8.34,10.35, height 13.3
"Schottky Diode SOT23 BAT54C" [mm] "Schottky Diode SOT23 BAT54C"
  rrect25% 1.12x0.6 smd: 1(-1.075,0.915) 2(-1.075,-0.915) 3(1.075,0)
  silkscreen extent -2.35,-1.45 0.65,1.45, body extent -1.2,-1.45 1.2,1.45, height 1.14
"ScrewHole_3.75mmD - duplicate" [mm] "SCREW HEAD DIA 4.5MM, SREW LEG DIA 3 MM"
  round 3.75 hole 3.75 unplated: 1(0,0)
  silkscreen extent -2.3,-2.3 2.3,2.3
SOIC-SN8_N [mm] "SOIC, 8-Leads, Body 4.9x3.9mm, Pitch 1.27mm, IPC Medium Density"
  oval 2.2x0.6 smd: 1(-2.4,1.905) 2(-2.4,0.635) 3(-2.4,-0.635) 4(-2.4,-1.905) 5(2.4,-1.905) 6(2.4,-0.635) 7(2.4,0.635) 8(2.4,1.905)
  silkscreen extent -2.52,-2.5 0.9,2.88, body extent -2,-2.5 2,2.5, height 1.75
SOT95P270X145-5N [mm]
  rect 1.4x0.6 smd: 1(-1.25,0.95) 2(-1.25,0) 3(-1.25,-0.95) 4(1.25,-0.95) 5(1.25,0.95)
  silkscreen extent -1.95,-1.45 0.2,1.5
SOT95P280X110-6N [mm]
  rrect25% 1.45x0.59 smd: 1(-1.155,0.95) 2(-1.155,0) 3(-1.155,-0.95) 4(1.155,-0.95) 5(1.155,0) 6(1.155,0.95)
  silkscreen extent -2.5,-1.56 0.8,1.56, body extent -1.4,-1.45 1.4,1.45, height 1.1
"STM32F401RE Cortex-M4" [mm] "ARMÂ® CortexÂ®-M4 STM32F4 Microcontroller IC 32-Bit Single-Core 84MHz 512KB (512K x 8) FLASH 64-LQFP (10x10)"
  rect 1.5x0.3 smd: 1(-5.67,3.75) 2(-5.67,3.25) 3(-5.67,2.75) 4(-5.67,2.25) 5(-5.67,1.75) 6(-5.67,1.25) 7(-5.67,0.75) 8(-5.67,0.25) 9(-5.67,-0.25) 10(-5.67,-0.75) 11(-5.67,-1.25) 12(-5.67,-1.75) 13(-5.67,-2.25) 14(-5.67,-2.75) 15(-5.67,-3.25) 16(-5.67,-3.75) 33(5.67,-3.75) 34(5.67,-3.25) 35(5.67,-2.75) 36(5.67,-2.25) 37(5.67,-1.75) 38(5.67,-1.25) 39(5.67,-0.75) 40(5.67,-0.25) 41(5.67,0.25) 42(5.67,0.75) 43(5.67,1.25) 44(5.67,1.75) 45(5.67,2.25) 46(5.67,2.75) 47(5.67,3.25) 48(5.67,3.75)
  rect 0.3x1.5 smd: 17(-3.75,-5.67) 18(-3.25,-5.67) 19(-2.75,-5.67) 20(-2.25,-5.67) 21(-1.75,-5.67) 22(-1.25,-5.67) 23(-0.75,-5.67) 24(-0.25,-5.67) 25(0.25,-5.67) 26(0.75,-5.67) 27(1.25,-5.67) 28(1.75,-5.67) 29(2.25,-5.67) 30(2.75,-5.67) 31(3.25,-5.67) 32(3.75,-5.67) 49(3.75,5.67) 50(3.25,5.67) 51(2.75,5.67) 52(2.25,5.67) 53(1.75,5.67) 54(1.25,5.67) 55(0.75,5.67) 56(0.25,5.67) 57(-0.25,5.67) 58(-0.75,5.67) 59(-1.25,5.67) 60(-1.75,5.67) 61(-2.25,5.67) 62(-2.75,5.67) 63(-3.25,5.67) 64(-3.75,5.67)
  silkscreen extent -6.05,-5 5,5, body extent -6,-6 6,6, height 1.6
"TANT CAP 3528(B)" [mm] "10 ÂµF Molded Tantalum Polymer Capacitor 25 V 1411 (3528 Metric), 1210 150mOhm TCJB106M025R0150"
  rect 1.34x3.02 smd: 1(-1.54,0) 2(1.54,0)
  silkscreen extent -0.55,-1.5 0.55,1.5, body extent -1.75,-1.4 1.75,1.4, height 2.1
TE_282811-4 [mm]
  rect 2.1x2.1 hole 1.4: 1(-7.5,0)
  round 2.1 hole 1.4: 2(-2.5,0) 3(2.5,0) 4(7.5,0)
  silkscreen extent -10,-3.1 10,10
"TVS SMAJ6.0CA DO-214AC (SMA)" [mm] "SMAJ6.0CA WG Bidirectional TVS diode littlefuse DO-214AC (SMA)"
  rect 2.12x1.5 smd: 1(-2.115,0) 2(2.115,0)
  silkscreen extent -2.16,-1.28 2.16,1.28, body extent -2.57,-1.15 2.57,1.41, height 2.5
"W5500 LQFP-48" [mm] "W5500 LQFP-48 Hardwired TCP/IP embedded Ethernet controller QFP50P900X900X160-48N"
  rect 1.56x0.28 smd: 1(-4.18,2.75) 2(-4.18,2.25) 3(-4.18,1.75) 4(-4.18,1.25) 5(-4.18,0.75) 6(-4.18,0.25) 7(-4.18,-0.25) 8(-4.18,-0.75) 9(-4.18,-1.25) 10(-4.18,-1.75) 11(-4.18,-2.25) 12(-4.18,-2.75) 25(4.18,-2.75) 26(4.18,-2.25) 27(4.18,-1.75) 28(4.18,-1.25) 29(4.18,-0.75) 30(4.18,-0.25) 31(4.18,0.25) 32(4.18,0.75) 33(4.18,1.25) 34(4.18,1.75) 35(4.18,2.25) 36(4.18,2.75)
  rect 0.28x1.56 smd: 13(-2.75,-4.18) 14(-2.25,-4.18) 15(-1.75,-4.18) 16(-1.25,-4.18) 17(-0.75,-4.18) 18(-0.25,-4.18) 19(0.25,-4.18) 20(0.75,-4.18) 21(1.25,-4.18) 22(1.75,-4.18) 23(2.25,-4.18) 24(2.75,-4.18) 37(2.75,4.18) 38(2.25,4.18) 39(1.75,4.18) 40(1.25,4.18) 41(0.75,4.18) 42(0.25,4.18) 43(-0.25,4.18) 44(-0.75,4.18) 45(-1.25,4.18) 46(-1.75,4.18) 47(-2.25,4.18) 48(-2.75,4.18)
  silkscreen extent -5.55,-3.55 3.55,3.55, body extent -4.5,-4.5 4.5,4.5, height 1.6

## Part data
B1: "2K 256X8 1.8V Ser.EEPROM,24AA02E48T-I/OT", Arrow Part Number=24AA02E48T-I/OT, Manufacturer_Name=Microchip, Mouser Part Number=579-24AA02E48TIOT, Arrow Price/Stock=https://www.arrow.com/en/products/24aa02e48t-iot/microchip-technology?utm_currency=USD&region=nac, Datasheet Link=https://datasheet.datasheetarchive.com/originals/distributors/SFDatasheet-11/sf-000234844.pdf, Geometry.Height=1.45mm, Manufacturer_Part_Number=24AA02E48T-I/OT, Mouser Price/Stock=https://www.mouser.co.uk/ProductDetail/Microchip-Technology/24AA02E48T-I-OT?qs=h8kCHL4kpM5dzsPTuTrxSQ%3D%3D
BT1: "Battery Holder (Open) Coin, 20.0mm 1 Cell SMD (SMT) Tab, CR2032, BS-7-RED", Package=None, Availability=Unavailable, MP=BS-7-RED, Price=None
C1 C2 C3 C4 C5 C6 C7 C8 C10 C11 C12 C13 C14 C15 C16 C17 C18 C19 C20 C21 C22 C23 C24 C25 C26 C27 C28 C29 C31 C32 C33 C34 C35 C36 C39 C41: library part "CAP CER 0.1uF/50V 5%", "CAP CER 0.1uF/50V  Ceramic Capacitor X7R 0805 (2012 Metric) SMT", Package="0805 Samsung", Check_prices=https://www.snapeda.com/parts/CL21B104KCFNNNE/Samsung+Electro-Mechanics/view-part/?ref=eda, Digi-Key_Part_Number=1276-6840-2-ND, MF=Samsung, MP=CL21B104KCFNNNE, Purchase-URL=https://pricing.snapeda.com/search?q=CL21B104KCFNNNE&ref=eda, SnapEDA_Link=https://www.snapeda.com/parts/CL21B104KCFNNNE/Samsung+Electro-Mechanics/view-part/?ref=snap
C9 C40: "10 ÂµF Molded Tantalum Polymer Capacitor 25 V 1411 (3528 Metric), 1210 150mOhm TCJB106M025R0150", Package="1210 AVX", Check_prices=https://www.snapeda.com/parts/TCJB106M025R0150/AVX/view-part/?ref=eda, MF=AVX, MP=TCJB106M025R0150, SnapEDA_Link=https://www.snapeda.com/parts/TCJB106M025R0150/AVX/view-part/?ref=snap
C30: "1000 pF Â±10% 2000V (2kV) Ceramic Capacitor X7R 1206 (3216 Metric) C1206C102KGRACAUTO", Package="3216 KEMET", Check_prices=https://www.snapeda.com/parts/C1206C102KGRACAUTO/KEMET/view-part/?ref=eda, MF=KEMET, MP=C1206C102KGRACAUTO, SnapEDA_Link=https://www.snapeda.com/parts/C1206C102KGRACAUTO/KEMET/view-part/?ref=snap
C37 C38: library part "CAP CER 0.1uF/50V 5%", "CAP CER 22uF/50V  Ceramic Capacitor X7R 0805 (2012 Metric) SMT", Package="0805 Samsung", Check_prices=https://www.snapeda.com/parts/CL21B104KCFNNNE/Samsung+Electro-Mechanics/view-part/?ref=eda, Digi-Key_Part_Number=1276-6840-2-ND, MF=Samsung, MP=CL21B104KCFNNNE, Purchase-URL=https://pricing.snapeda.com/search?q=CL21B104KCFNNNE&ref=eda, SnapEDA_Link=https://www.snapeda.com/parts/CL21B104KCFNNNE/Samsung+Electro-Mechanics/view-part/?ref=snap
C42 C43: library part "CAP CER 0.1uF/50V 5%", "CAP CER 0.1uF/50V  Ceramic Capacitor X7R 0805 (2012 Metric)", Package="0805 Samsung", Check_prices=https://www.snapeda.com/parts/CL21B104KCFNNNE/Samsung+Electro-Mechanics/view-part/?ref=eda, Digi-Key_Part_Number=1276-6840-2-ND, MF=Samsung, MP=CL21B104KCFNNNE, Purchase-URL=https://pricing.snapeda.com/search?q=CL21B104KCFNNNE&ref=eda, SnapEDA_Link=https://www.snapeda.com/parts/CL21B104KCFNNNE/Samsung+Electro-Mechanics/view-part/?ref=snap
CON1 CON2 J2 J3 J8: "3 Pin Terminal Block HDR 5MM THT RA 231-433_001-000", Package=None, Availability=Unavailable, MF=WAGO, MP=231-433/001-000, Price=None, SnapEDA_Link=https://www.snapeda.com/parts/231-433/001-000/WAGO/view-part/482062/?ref=snap
D1 D3 D6 D7 D8 D9 D10 D16 D17: "Red 640nm LED Indication - Discrete 1.85V 0805 (2012 Metric) APT2012SRCPRV", Package="0805 Kingbright", Check_prices=https://www.snapeda.com/parts/APT2012SRCPRV/Kingbright/view-part/?ref=eda, MF=Kingbright, MP=APT2012SRCPRV, SnapEDA_Link=https://www.snapeda.com/parts/APT2012SRCPRV/Kingbright/view-part/?ref=snap
D2 D4 D15: "M7 General Purpose SMD Rectifier Diode SMA (DO-214AC) 1A 1000V 1n4007 RS2MA", Package="DO-214AC-2 Taiwan Semiconductor", Check_prices=https://www.snapeda.com/parts/RS2MA/Taiwan+Semiconductor/view-part/?ref=eda, MF="Taiwan Semiconductor", MP=RS2MA, SnapEDA_Link=https://www.snapeda.com/parts/RS2MA/Taiwan+Semiconductor/view-part/?ref=snap
D5: library part "Schottky Diode SOT23 BAT54C", "Schottky Diode 2x ComCath 0.2A 30V SOT23", Package="SOT-23 Diodes Inc.", Check_prices=https://www.snapeda.com/parts/BAT54C-7-F/Diodes+Inc./view-part/?ref=eda, MF="Diodes Inc.", MP=BAT54C-7-F, SnapEDA_Link=https://www.snapeda.com/parts/BAT54C-7-F/Diodes+Inc./view-part/?ref=snap
D11 D12 D13: library part "TVS SMAJ6.0CA DO-214AC (SMA)", "SMAJ6.0CA WG Bidirectional TVS diode littlefuse DO-214AC (SMA)", Package=None, Availability=Unavailable, MP=SMAJ7.5CA, Price=None
D14: "DIODE-1N4148W-SOD-80 is a general-purpose silicon diode LL4148_L1G", Package=None, Availability=Unavailable, MP=LL4148_L1G, Price=None
F1 F2: "Polymeric PTC Resettable Fuse 60V 100 mA Ih Surface Mount 1812 (4532 Metric), Concave, MF-MSMF010-2", Package="1812 Bourns", Availability="In Stock", Check_prices=https://www.snapeda.com/parts/MF-MSMF010-2/Bourns/view-part/?ref=eda, MF=Bourns, MP=MF-MSMF010-2, Price=None, Purchase-URL=https://pricing.snapeda.com/search/part/MF-MSMF010-2/?ref=eda, SnapEDA_Link=https://www.snapeda.com/parts/MF-MSMF010-2/Bourns/view-part/?ref=snap
FB1: "MH2029-101Y-Bourns Inc.-Ferrite Bead, 100 Ohms @ 100 MHz , Signal Line Ferrite Bead 0805 (2012 Metric) 2A 100mOhm", Package=None, Availability=Unavailable, MP=MPZ2012S102AT000, Price=None
H1 H2 H3 H4: "SCREW HEAD DIA 4.5MM, SREW LEG DIA 3 MM"
J1 J5: "4 Position Terminal Block Header, Male Pins, Shrouded (2 Side) 0.197 (5.00mm) 90Â°, Right Angle Through Hole", Package=None, Availability=Good, Centerline_Pitch="5 mm[.197 in]", DigiKey-Purchase-URL=https://snapeda.com/shop?store=DigiKey&id=2383458, EU_RoHS_Compliance=Compliant, MF="TE Connectivity", Mouser-Purchase-URL=https://snapeda.com/shop?store=Mouser&id=2383458, MP=282811-4, Number_of_Positions=4, Price=None, SnapEDA_Link=https://www.snapeda.com/parts/282811-4/TE%20Connectivity%20AMP%20Connectors/view-part/2383458/?ref=snap
J4: "Conn Unshrouded Header HDR 4 POS 2.54mm Solder ST Top Entry Thru-Hole Bulk TSW-104-17-G-S-LL", Package=None, Check_prices=https://www.snapeda.com/parts/TSW-104-23-H-S-LL/Samtec/view-part/?ref=eda, MF=Samtec, MP=TSW-104-23-H-S-LL, SnapEDA_Link=https://www.snapeda.com/parts/TSW-104-23-H-S-LL/Samtec/view-part/?ref=snap
J6: "BergStik, Board to Board connector, Unshrouded Vertical Header, Through Hole, Single Row, 6 Positions, 2.54 mm (0.100in) Pitch. 68604-406HLF", Package=None, Check_prices=https://www.snapeda.com/parts/68604-406HLF/Amphenol/view-part/?ref=eda, MF="AMPHENOL ICC / FCI", MP=68604-406HLF, SnapEDA_Link=https://www.snapeda.com/parts/68604-406HLF/Amphenol/view-part/?ref=snap
J7: "10/100 BaseT, 8P8C, Horizontal, Shielded, LED, Through Hole, 6 Âµin Plating, RJ45 with Integrated Magnetics Modular Connector CRJ011-ML1-TH", Package=None, Check_prices=https://www.snapeda.com/parts/CRJ011-ML1-TH/Same+Sky/view-part/?ref=eda, MF="Same Sky", MP=CRJ011-ML1-TH, SnapEDA_Link=https://www.snapeda.com/parts/CRJ011-ML1-TH/Same+Sky/view-part/?ref=snap
J9: "2 Pin Terminal Block HDR 5MM THT RA _OQ0271510000G", Package=None, Check_prices=https://www.snapeda.com/parts/OQ0271510000G/Amphenol/view-part/?ref=eda, MF="Amphenol Anytek", MP=OQ0271510000G, SnapEDA_Link=https://www.snapeda.com/parts/OQ0271510000G/Amphenol/view-part/?ref=snap
K1 K2: "Relays General Purpose Non Latching 3VDC SPDT 10A (250VAC) Max 5PIN SRD-03VDC-SL-C", Package="NON STANDARD-5 Songle Relay", Check_prices=https://www.snapeda.com/parts/SRD-03VDC-SL-C/Songle+Relay/view-part/?ref=eda, MF="Songle Relay", MP=SRD-03VDC-SL-C, SnapEDA_Link=https://www.snapeda.com/parts/SRD-03VDC-SL-C/Songle+Relay/view-part/?ref=snap
L1: "SWPA8040S120MT SMD 8.0×8.0x4.0mm 8040S 12uH Â±20% 2.8A 142 mOhm SMT Shielded Wirewound Inductor", Package="Nonstandard Abracon LLC", Availability="In Stock", Check_prices=https://www.snapeda.com/parts/ASPI-8040S-510M-T/Abracon+LLC/view-part/?ref=eda, MF="Abracon LLC", MP=ASPI-8040S-510M-T, Price=None, Purchase-URL=https://pricing.snapeda.com/search/part/ASPI-8040S-510M-T/?ref=eda, SnapEDA_Link=https://www.snapeda.com/parts/ASPI-8040S-510M-T/Abracon+LLC/view-part/?ref=snap
PS1: library part RFM-0505S, "DC-DC Converter/Isolator, SIP4, 1kV unreg, Single Output, 1W, 5V Out, RFM Series", Package="SIP-4 Recom Power", Check_prices=https://www.snapeda.com/parts/RFM-0505S/Recom+Power/view-part/?ref=eda, MF="Recom Power", MP=RFM-0505S, SnapEDA_Link=https://www.snapeda.com/parts/RFM-0505S/Recom+Power/view-part/?ref=snap
Q1 Q2: "NPN SMT BC848C_RFG SOT-23, 30V, 0.1A, NPN Transistor", Package="SOT-23 Taiwan Semiconductor", Check_prices=https://www.snapeda.com/parts/BC848C%20RFG/Taiwan+Semiconductor/view-part/?ref=eda, MF="Taiwan Semiconductor", MP="BC848C RFG", SnapEDA_Link=https://www.snapeda.com/parts/BC848C%20RFG/Taiwan+Semiconductor/view-part/?ref=snap
R1 R2 R4 R5 R9 R10 R28 R29 R30 R35 R37 R38 R49 R53 R55: "RESISTOR, THICK FILM, 10K, 5%, 0805 0.25W SMT", Package="805-2 Panasonic", Availability="In Stock", Check_prices=https://www.snapeda.com/parts/ERJ-6GEYJ103V/Panasonic+Electronic+Components/view-part/?ref=eda, MF="Panasonic Electronic", MP=ERJ-6GEYJ103V, Price=None, Purchase-URL=https://pricing.snapeda.com/search/part/ERJ-6GEYJ103V/?ref=eda, SnapEDA_Link=https://www.snapeda.com/parts/ERJ-6GEYJ103V/Panasonic+Electronic+Components/view-part/?ref=snap
R3 R6 R7 R8 R11 R12 R13 R14 R15 R16 R17 R18 R19 R20 R21 R22 R23 R24 R25 R26 R27 R31 R32 R33 R34 R36 R39 R40 R41 R42 R43 R44 R45 R46 R47 R48 R50 R51 R52 R57 R58: library part "RES 10K 0.25W 5% 0805", "RESISTOR, THICK FILM, 10K, 5%, 0805 0.25W SMT", Package="805-2 Panasonic", Availability="In Stock", Check_prices=https://www.snapeda.com/parts/ERJ-6GEYJ103V/Panasonic+Electronic+Components/view-part/?ref=eda, MF="Panasonic Electronic", MP=ERJ-6GEYJ103V, Price=None, Purchase-URL=https://pricing.snapeda.com/search/part/ERJ-6GEYJ103V/?ref=eda, SnapEDA_Link=https://www.snapeda.com/parts/ERJ-6GEYJ103V/Panasonic+Electronic+Components/view-part/?ref=snap
R54: library part "RES 10K 0.25W 5% 0805", "RESISTOR, THICK FILM, 15K, 5%, 0805 0.25W SMT", Package="805-2 Panasonic", Availability="In Stock", Check_prices=https://www.snapeda.com/parts/ERJ-6GEYJ103V/Panasonic+Electronic+Components/view-part/?ref=eda, MF="Panasonic Electronic", MP=ERJ-6GEYJ103V, Price=None, Purchase-URL=https://pricing.snapeda.com/search/part/ERJ-6GEYJ103V/?ref=eda, SnapEDA_Link=https://www.snapeda.com/parts/ERJ-6GEYJ103V/Panasonic+Electronic+Components/view-part/?ref=snap
R56: library part "RES 10K 0.25W 5% 0805", "RESISTOR, THICK FILM, 75K, 5%, 0805 0.25W SMT", Package="805-2 Panasonic", Availability="In Stock", Check_prices=https://www.snapeda.com/parts/ERJ-6GEYJ103V/Panasonic+Electronic+Components/view-part/?ref=eda, MF="Panasonic Electronic", MP=ERJ-6GEYJ103V, Price=None, Purchase-URL=https://pricing.snapeda.com/search/part/ERJ-6GEYJ103V/?ref=eda, SnapEDA_Link=https://www.snapeda.com/parts/ERJ-6GEYJ103V/Panasonic+Electronic+Components/view-part/?ref=snap
U1: library part STM32F401RET6, "ARMÂ® CortexÂ®-M4 STM32F4 Microcontroller IC 32-Bit Single-Core 84MHz 512KB (512K x 8) FLASH 64-LQFP (10x10)", Package="LQFP-64 STMicroelectronics", Check_prices=https://www.snapeda.com/parts/STM32F401RET6/STMicroelectronics/view-part/?ref=eda, MF=STMicroelectronics, MP=STM32F401RET6, SnapEDA_Link=https://www.snapeda.com/parts/STM32F401RET6/STMicroelectronics/view-part/?ref=snap
U2 U3: library part "Optclr EL817S1-FV", "Optoisoltr 5kv Transistor 4-Smd EL817S1-FV", Package=None, Availability=Unavailable, MF="{'manufacturer': u'Everlight Electronics Co Ltd'}", MP=EL817S1(A)(TU)-V, Price=None
U4: "EEPROM Memory IC 512Kb (64K x 8) IÂ²C 400 kHz 900 ns SOIC-8 AT24C512C-SSHM-T", Package="SO-8 Microchip", Check_prices=https://www.snapeda.com/parts/AT24C512C-SSHM-T/Microchip/view-part/?ref=eda, MF=Microchip, MP=AT24C512C-SSHM-T, SnapEDA_Link=https://www.snapeda.com/parts/AT24C512C-SSHM-T/Microchip/view-part/?ref=snap
U5: library part CMP-0159-00177-1, "2Kbit, 400kHz, 1.7V, I2C Serial EEPROM with EUI-48 Node Identity, 8-Pin SOIC 150mil, Industrial Temperature, Tape and Reel", Code_IPC=SOIC127P600-8, Code_JEDEC=MS-012, DatasheetVersion="revB, Jan-2009", PackageDescription="8-Lead Plastic Small Outline (SN) - Narrow, 3.90mm Body [SOIC]", PackageReference=SOIC-SN8, PackageVersion="revBB, Aug-2009"
U6: library part W5500, "W5500 LQFP-48 Hardwired TCP/IP embedded Ethernet controller", Package=None, Availability=Unavailable, MP=W5500, Price=None
U7: library part 74HC14D,653, "Inverter IC 6 Channel Schmitt Trigger 14-SO/SOIC-14", Package="SO14-14 Nexperia USA Inc.", Check_prices=https://www.snapeda.com/parts/74HC14D,653/Nexperia/view-part/?ref=eda, MF="Nexperia USA", MP=74HC14D,653, SnapEDA_Link=https://www.snapeda.com/parts/74HC14D,653/Nexperia/view-part/?ref=snap
U8: library part MAX485CSA, "MAX485CSA-RS-485/RS-422 Transceivers, SOIC-8", Package="SOIC-8 Maxim", Check_prices=https://www.snapeda.com/parts/MAX485CSA+/Analog+Devices/view-part/?ref=eda, MF="Analog Devices", MP=MAX485CSA+, SnapEDA_Link=https://www.snapeda.com/parts/MAX485CSA+/Analog+Devices/view-part/?ref=snap
U9: "4.5V to 28V Input, 2A Output, EMI Friendly Synchronous Step-Down Converter", Package="SOT-23-THN-6 Texas Instruments", Check_prices=https://www.snapeda.com/parts/TPS54202DDCT/Texas+Instruments/view-part/?ref=eda, MF="Texas Instruments", MP=TPS54202DDCT, SnapEDA_Link=https://www.snapeda.com/parts/TPS54202DDCT/Texas+Instruments/view-part/?ref=snap
VR1: "LM1117IMPX-3.3V 800-mA 15-V linear voltage regulator SOT-223", Package="SOT-223-4 Texas Instruments", Check_prices=https://www.snapeda.com/parts/LM1117IMPX-5.0/NOPB/Texas+Instruments/view-part/?ref=eda, MF="Texas Instruments", MP=LM1117IMPX-5.0/NOPB, SnapEDA_Link=https://www.snapeda.com/parts/LM1117IMPX-5.0/NOPB/Texas+Instruments/view-part/?ref=snap
XTAL1: "No Description Available", Manufacturer_Name=Multicomp, Copyright="Copyright (C) 2026 Ultra Librarian. All rights reserved.", Manufacturer_Part_Number=MCRJ332768F1220HOW
Y1 Y2: library part "Crystal 16 Mhz SMD 2 pin_1", "16 MHz Â±30ppm Crystal 20pF 60 Ohms HC-49/US FOXSDLF/128-20 16 Mhz Crystal SMD –CSM-4ALX(28ALX) 12.5mmX4.85mmX4mm", Package="HC49SD Fox Electronics", Check_prices=https://www.snapeda.com/parts/FOXSDLF/128-20/Fox+Electronics/view-part/?ref=eda, MF="Fox Electronics", MP=FOXSDLF/128-20, SnapEDA_Link=https://www.snapeda.com/parts/FOXSDLF/128-20/Fox+Electronics/view-part/?ref=snap

## Via types
v1: diameter 0.5, hole 0.3, Top Layer to Bottom Layer, 101 vias
v2: diameter 0.5, hole 0.2, Top Layer to Bottom Layer, 5 vias

## Nets (pads, with @x,y where several pads share a name; then routed paths per layer and width w, separated by ;. In a path a pad name is that pad's centre, name@x,y a point inside that pad or via, vN(x,y) a via of type N, cw(c..) or ccw(c..) an arc to the next point about the centre after c; other vN are vias at no path point)
3V3: B1.4 C1.2 C2.2 C3.2 C4.2 C5.2 C7.2 C14.2 C15.2 C16.2 C40.1 C41.2 D5.1 FB1.1 J4.01 R5.1 R12.2 R14.1 R18.2 R19.1 R21.2 R23.2 R24.2 R28.2 R29.2 R30.2 R35.2 R37.2 R38.2 R58.2 U1.13 U1.19 U1.32 U1.48 U1.64 U4.8 U5.8 U6.28 VR1.2 VR1.4 | length 373
  Top Layer w0.254: R21.2@30.516,63.623 R21.2@30.607,63.532 ; C14.2@38.47,50.8 C14.2@38.597,50.927 ; U5.8@40.627,67.183 U5.8@40.848,67.183 ; C3.2@48.388,60.578 v1(49.657,59.309) ; v1@49.657,59.423 49.704,59.423 49.914,59.633 50.225,59.944 52.736,59.944 ; 52.754,59.926 U1.32@55.188,57.492 ; R14.1@55.215,76.789 55.215,75.976 55.499,75.692 67.564,75.692 70.543,72.713 R5.1@70.543,69.146 70.54,69.146 C1.2@69.087,67.692 69.087,67.606 68.453,66.972 68.453,65.92 63.843,61.31 63.832,61.31 63.609,61.087 60.785,61.087 56.134,65.738 56.134,66.04 v1(56.642,66.548) 55.626,67.564 C2.2@55.499,67.564 ; 61.438,75.717 R12.2@61.438,76.789 ; U1.64@68.51,54.776 71.851,51.435 75.057,51.435 C5.2@75.692,50.8 ; U6.28@103.866,45.963 103.879,45.976 103.879,49.396 106.358,51.875 107.512,51.875 C15.2@107.696,52.059 ; C15.2@108.21,51.695 C15.2@108.39,51.875
  Top Layer w0.3: v1(57.531,43.053) 56.389,44.195 C4.2@56.389,44.197 57.277,45.085 57.277,46.259 U1.48@60.491,49.473
  Top Layer w0.5: v1(30.48,65.151) 29.122,65.151 28.829,64.858 28.829,51.22 29.122,50.927 v1(31.496,50.927) ; R21.2@30.516,63.623 v1@30.516,65.115 ; v1(30.607,69.088) 30.607,76.073 31.115,76.581 32.909,76.581 R19.1@33.117,76.789 33.706,76.2 39.259,76.2 R18.2@39.848,76.789 ; v1(36.957,50.8) 37.02,50.863 38.406,50.863 C14.2@38.47,50.8 ; R24.2@38.576,53.086 R23.2@38.576,55.118 ; C14.2@38.597,50.927 R24.2@38.597,53.065 ; B1.4@39.477,69.408 40.601,69.408 40.894,69.115 ; R18.2@40.079,76.558 40.894,75.743 40.894,69.115 ; U4.8@40.691,61.087 40.918,61.087 40.947,61.116 v1(40.947,62.177) ; U5.8@40.848,67.183 40.894,67.229 40.894,69.115 ; D5.1@85.725,22.733 85.775,22.783 86.067,22.783 86.36,23.076 86.36,28.033 86.879,28.552 C7.2@86.879,28.702
  Top Layer w0.75: R24.2@38.576,53.086 R24.2@38.597,53.065 ; v1(47.498,40.64) 47.498,36.507 48.064,35.941 v1(57.277,35.941) 72.39,35.941 73.025,36.576 J4.01@73.025,39.497 ; C5.2@75.692,50.8 75.878,50.8 84.006,58.928 v1(84.074,58.928) ; C7.2@86.879,28.829 86.879,28.979 87.079,29.179 88.361,29.179 v1(88.392,29.21) ; R28.2@87.598,48.26 87.79,48.452 87.79,49.309 88.265,49.784 v1(88.265,56.769) ; v1(87.63,33.274) R35.2@87.63,38.735 R28.2@87.63,48.26 ; C15.2@107.696,52.059 107.702,52.065 110.231,52.065 C16.2@110.236,52.07 FB1.1@112.268,52.07 ; FB1.1@112.649,52.041 112.649,54.034 112.776,54.161 v1(112.776,54.229) ; v1(113.792,59.436) 113.774,59.454 113.774,63.101 VR1.4@113.755,63.119 VR1.2@119.925,63.119 120.38,63.119 120.761,63.5 C41.2@122.925,63.5 ; C41.2@122.925,63.627 122.986,63.566 122.986,60.767 C40.1@123.047,60.706 C40.1@123.047,59.866 ; R58.2@123.095,57.531 122.901,57.725 123.041,57.725 123.047,57.731 C40.1@123.047,59.866 ; C40.1@123.342,59.571 C40.1@123.047,59.866
  Bottom Layer w0.254: v1@30.48,65.158 v1@30.543,65.222 ; v1@30.543,69.025 v1(30.607,69.088) ; v1(49.657,59.309) 56.595,66.247 56.595,66.501 v1(56.642,66.548)
  Bottom Layer w0.3: v1(57.277,35.941) 57.28,35.944 57.28,42.612 57.531,42.864 v1(57.531,43.053)
  Bottom Layer w0.5: v1(30.48,65.151) 34.417,65.151 37.391,62.177 v1(40.947,62.177) ; v1@30.543,65.222 v1@30.543,69.025 ; v1(31.496,50.927) 36.83,50.927 37.002,50.755 37.002,50.077 37.295,49.784 47.147,49.784
  Bottom Layer w0.75: v1(47.498,40.64) 47.498,40.708 47.147,41.059 47.147,49.784 47.147,56.799 v1(49.657,59.309) ; J4.01@73.025,39.497 73.164,39.636 73.164,41.668 87.283,55.787 ; v1(84.074,58.928) 84.142,58.928 87.283,55.787 ; v1(87.63,33.274) 88.392,32.512 v1(88.392,29.21) ; v1(112.776,54.229) 113.792,55.245 v1(113.792,59.436) 90.932,59.436 v1(88.265,56.769) 87.283,55.787
5VDC: C43.2 PS1.4 R13.1 R20.1 | length 66
  Top Layer w1: R20.1@39.37,90.583 v1(39.37,92.329) ; R13.1@59.309,90.202 v1(59.309,92.075) ; PS1.4@91.285,85.05 91.438,85.203 93.423,85.203 94.009,84.617 94.009,84.541 94.084,84.466 C43.2@94.234,84.466
  Bottom Layer w1: v1(39.37,92.329) 59.055,92.329 v1(59.309,92.075) 59.563,92.329 90.699,92.329 91.285,91.743 PS1.4@91.285,85.05
12VCC: D15.A J9.1 R1.1 R9.1 | length 182.9
  Top Layer w1.27: D15.A@112.395,82.125 J9.1@112.395,95.33
  Bottom Layer w1.27: R9.1@65.056,2.794 65.945,1.905 88.265,1.905 ; R1.1@88.265,4.286 88.265,1.905 ; J9.1@112.442,95.377 126.256,95.377 127,94.633 127,6.35 122.555,1.905 88.265,1.905
+5: C32.1 C33.2 C34.2 C37.1 C38.1 C39.2 C42.2 D2.C D4.C K1.COIL1 K2.COIL1 L1.2 PS1.2 R2.1 R3.2 R7.2 R10.1 R48.1 R49.2 R56.1 R57.2 U7.14 U8.8 VR1.3 | length 387.9
  Top Layer w0.5: v1(2.159,56.642) 15.043,56.642 15.06,56.625 U7.14@15.06,56.271 ; v1(16.383,72.771) 17.526,72.771 18.161,72.136 U8.8@18.161,70.663 ; R49.2@17.875,47.498 17.875,45.886 18.168,45.593 v1(24.511,45.593) 24.511,47.998 C33.2@24.712,48.199 ; C34.2@24.522,76.708 24.522,76.558 25.051,76.029 R48.1@25.051,74.295 25.262,74.084 C32.1@25.262,71.12 ; C34.2@24.522,76.858 25.019,77.355 v1(25.019,82.804)
  Top Layer w1: D4.C@24.963,37.219 26.693,37.219 26.701,37.211 26.924,37.434 ; R7.2@26.293,40.264 R7.2@26.299,40.259 ; K2.COIL1@26.701,30.765 26.924,30.988 26.924,37.434 ; v1(27.94,40.259) R7.2@26.299,40.259 ; D2.C@44.835,37.084 44.874,37.084 45.053,37.084 45.303,37.334 45.303,37.552 45.752,38.001 R3.2@45.752,40.64 ; K1.COIL1@44.989,30.885 D2.C@44.989,36.969 ; PS1.2@91.285,79.97 94.234,79.97 C42.2@94.234,79.894 94.309,79.969 99.905,79.969 100.308,79.566 L1.2@100.308,78.816 ; C37.1@100.319,71.12 C37.1@100.298,71.099 ; L1.2@100.505,78.994 100.308,78.797 C38.1@100.308,73.406 100.298,73.406 C37.1@100.298,71.099 ; VR1.3@119.925,65.419 119.917,65.454 VR1.3@119.917,65.786 ; C39.2@122.925,66.04 122.925,65.89 122.85,65.815 122.293,65.815 122.264,65.786 VR1.3@119.917,65.786 ; R7.2@26.299,40.259 26.924,39.634 26.924,37.434 ; C37.1@100.298,71.099 R56.1@100.298,68.961 R57.2@100.298,66.802 100.298,64.467 100.884,63.881 109.982,63.881 111.887,65.786 VR1.3@119.917,65.786
  Top Layer w1.27: D4.C@24.848,37.334 D4.C@24.963,37.219 ; D2.C@44.743,37.084 D2.C@44.835,37.084 ; D2.C@44.874,37.084 D2.C@44.989,36.969
  Bottom Layer w0.5: v1(16.383,72.771) 16.383,82.804 ; v1(24.511,45.593) 27.647,45.593 27.94,45.3 v1(27.94,40.259)
  Bottom Layer w1: K2.COIL1@26.701,30.765 26.701,28.43 27.445,27.686 ; K1.COIL1@44.989,30.765 44.989,27.686 ; R10.1@60.293,12.954 60.218,13.029 60.218,14.077 59.817,14.478 ; R2.1@81.502,14.478 60.218,14.478 59.817,14.478 ; PS1.2@91.285,79.97 89.105,79.97 88.519,80.556 88.519,89.408 87.757,90.17 26.162,90.17 25.019,89.027 v1(25.019,82.804) 16.383,82.804 5.881,82.804 2.159,79.082 v1(2.159,56.642) 2.159,28.448 2.921,27.686 27.445,27.686 ; 27.445,27.686 44.989,27.686 ; 44.989,27.686 44.989,27.147 46.736,25.4 53.213,25.4 54.483,24.13 54.483,15.064 55.069,14.478 59.817,14.478
+12: D15.C R54.1 U9.3 | length 11.8
  Top Layer w0.5: U9.3@111.826,73.672 111.826,77.016 D15.C@112.395,77.585
  Top Layer w1: D15.C@112.395,77.895 119.05,77.895 R54.1@119.729,77.216